# Altium PCB Gateway-Device-v1.0.PcbDoc (part 1 of 4)
Units mil, origin at the board's own origin, x right, y up, seen from the top; angles counter-clockwise.
Board outline 1968.5 x 3149.61 mil, 4 copper layers (Top Layer, Ground, Power, Bottom Layer), stack 61.654 mil thick; 142 components, 90 nets, 467 pads, 780 vias.
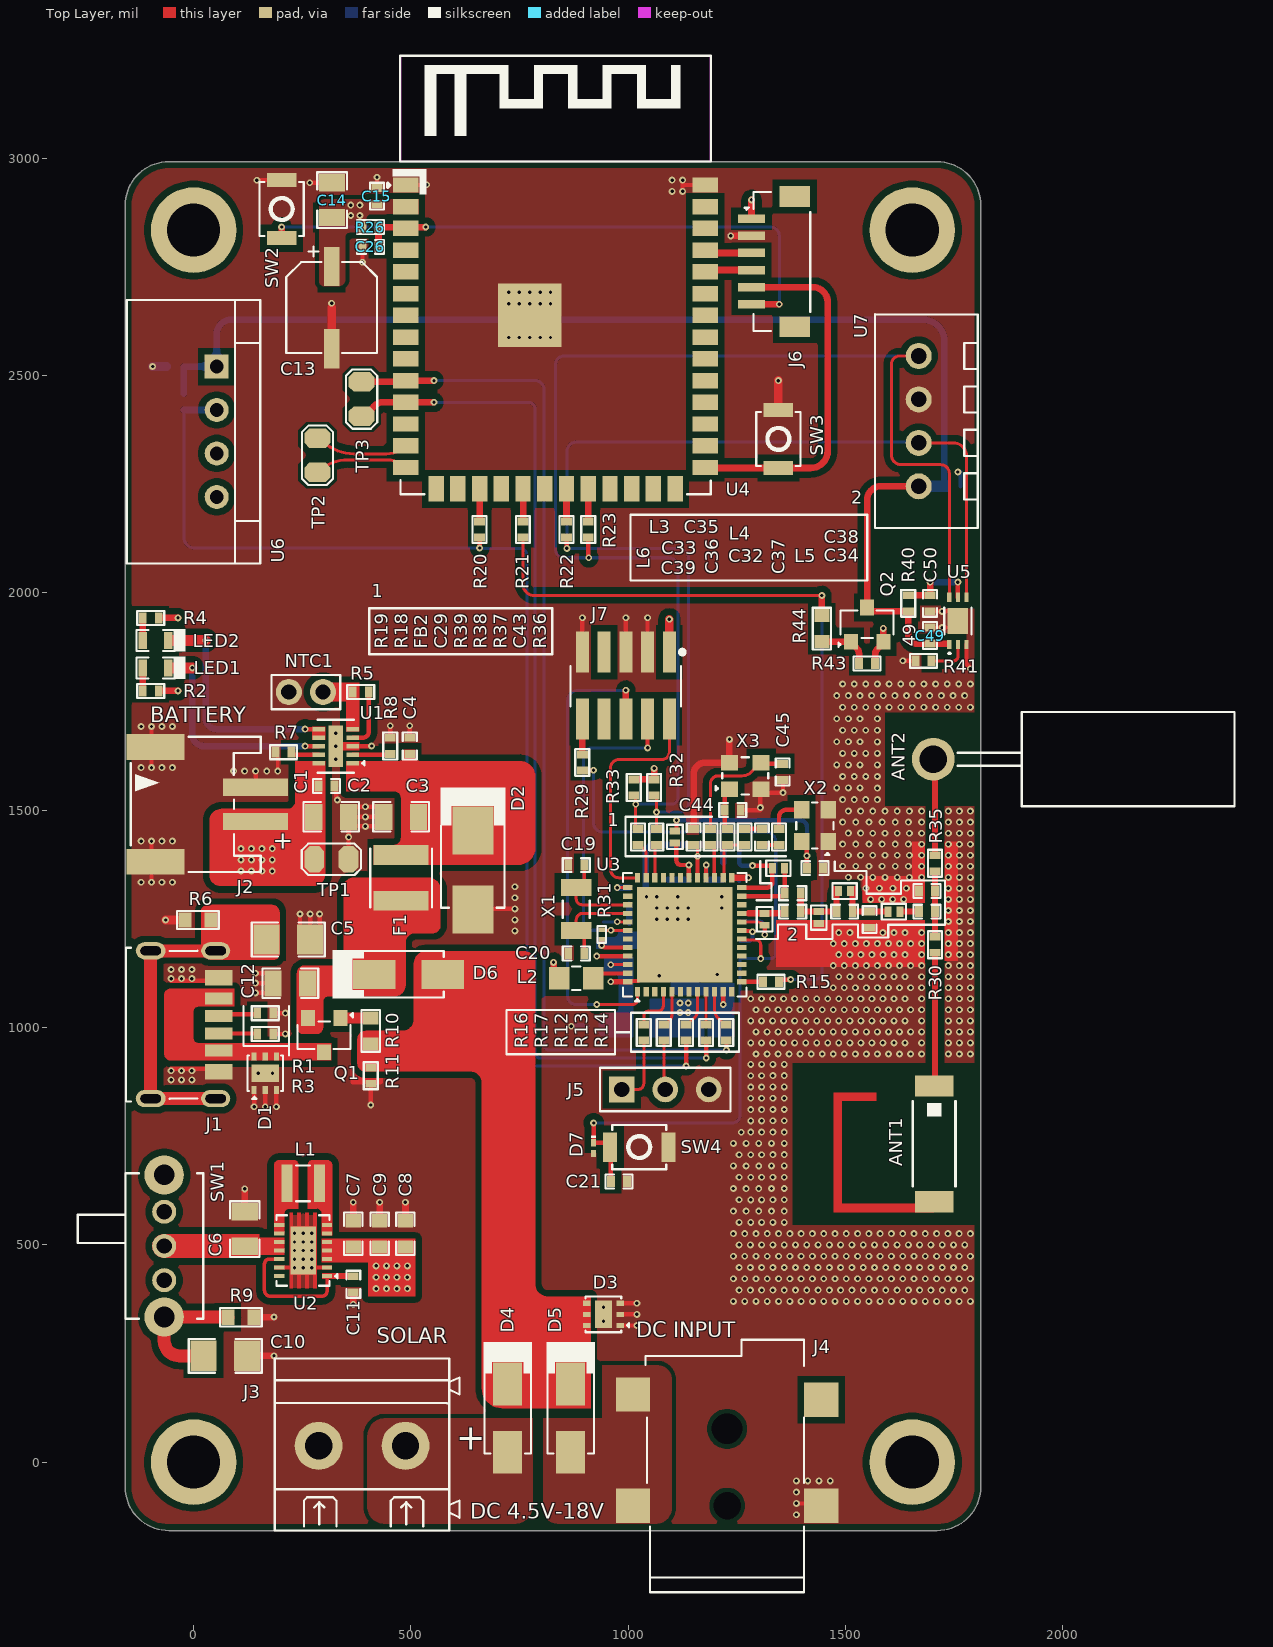
[diagram p0: Top Layer view]
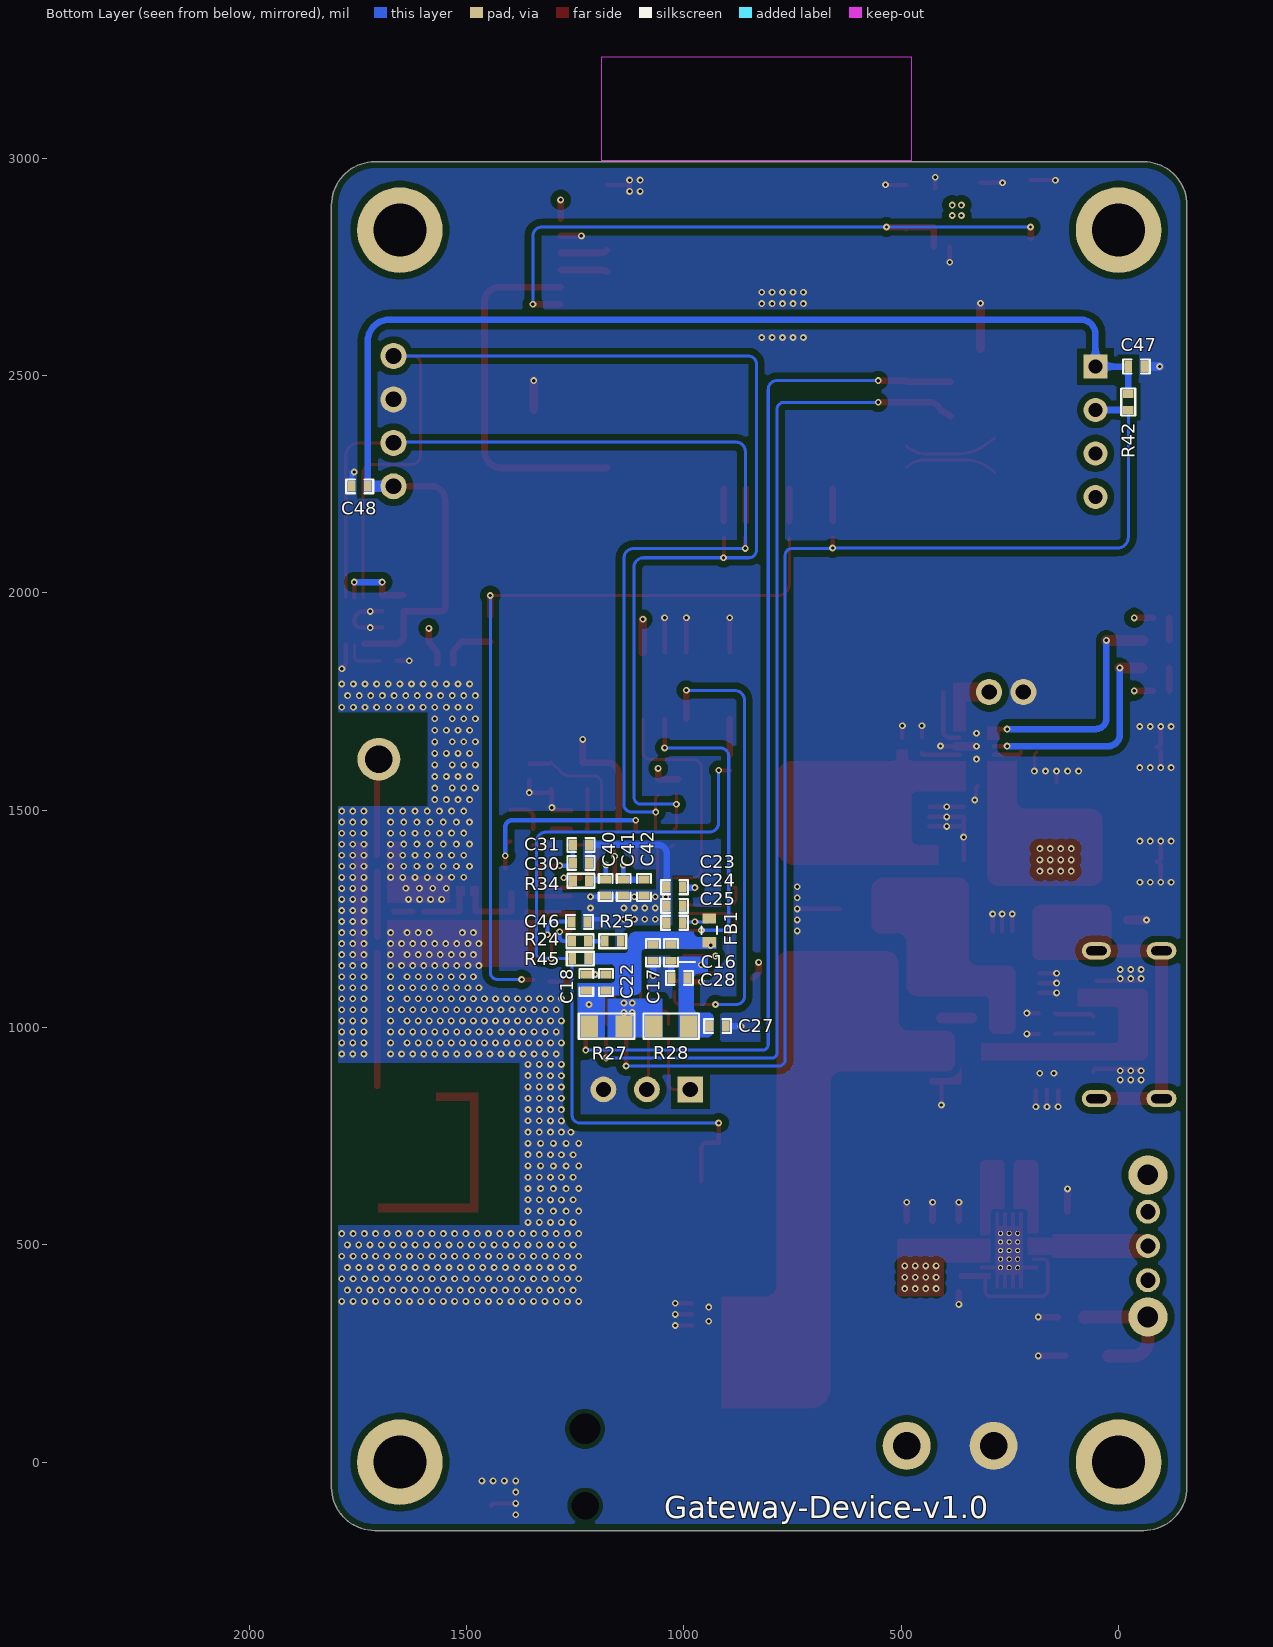
[diagram p1: Bottom Layer view, seen from below]
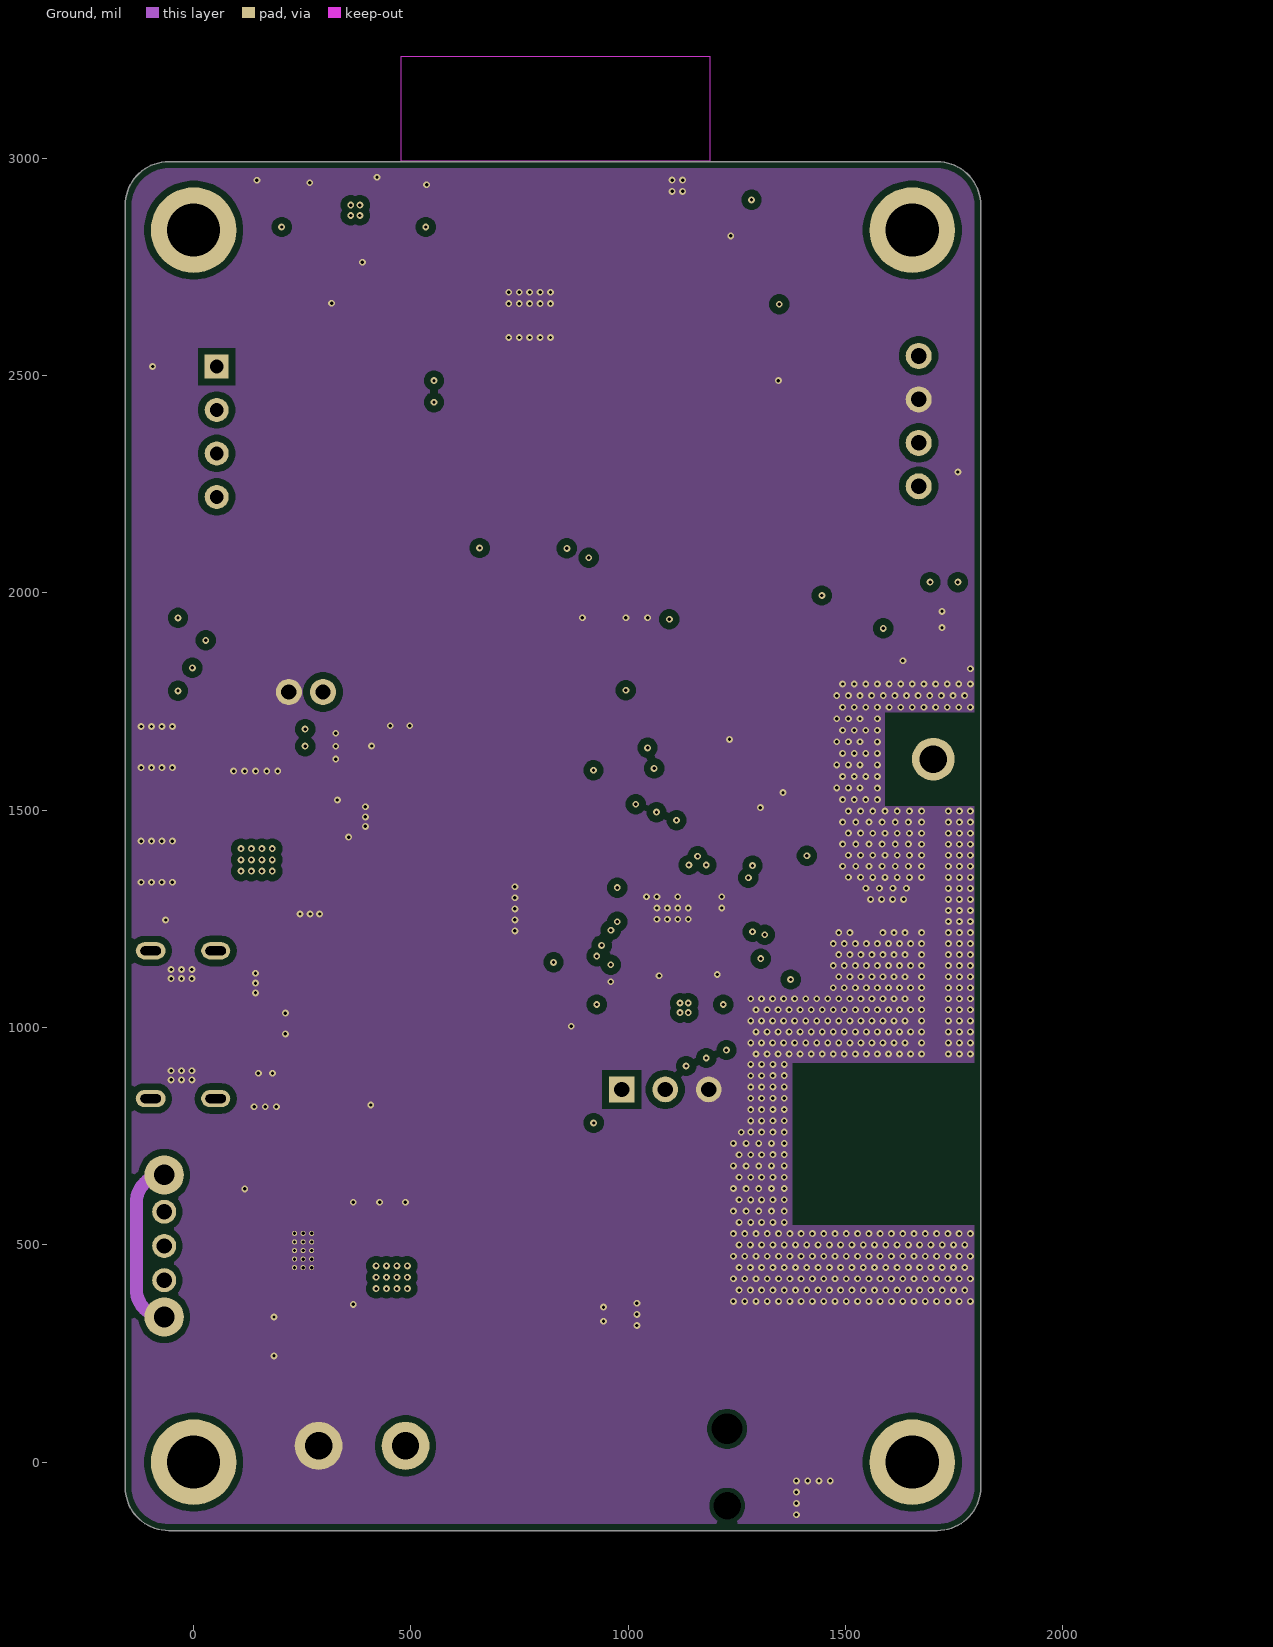
[diagram p2: Ground]
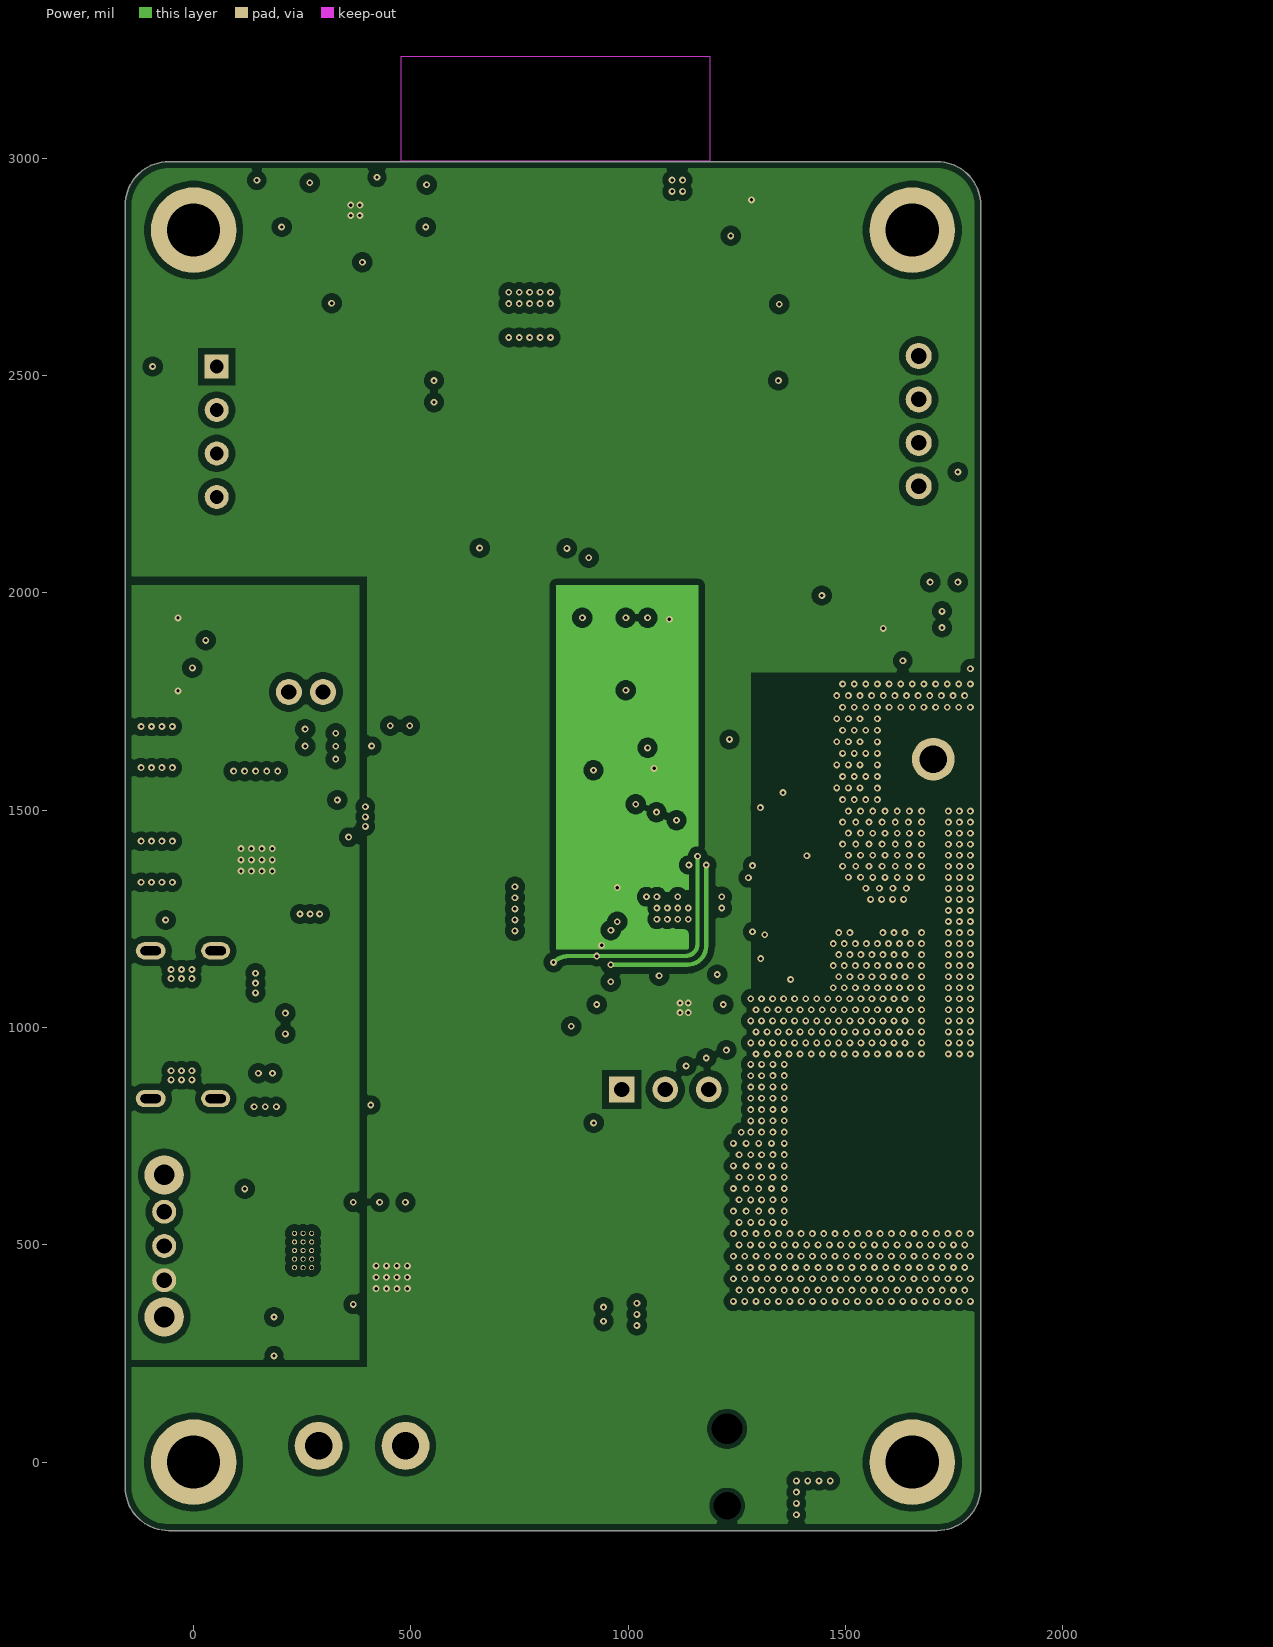
[diagram p3: Power]
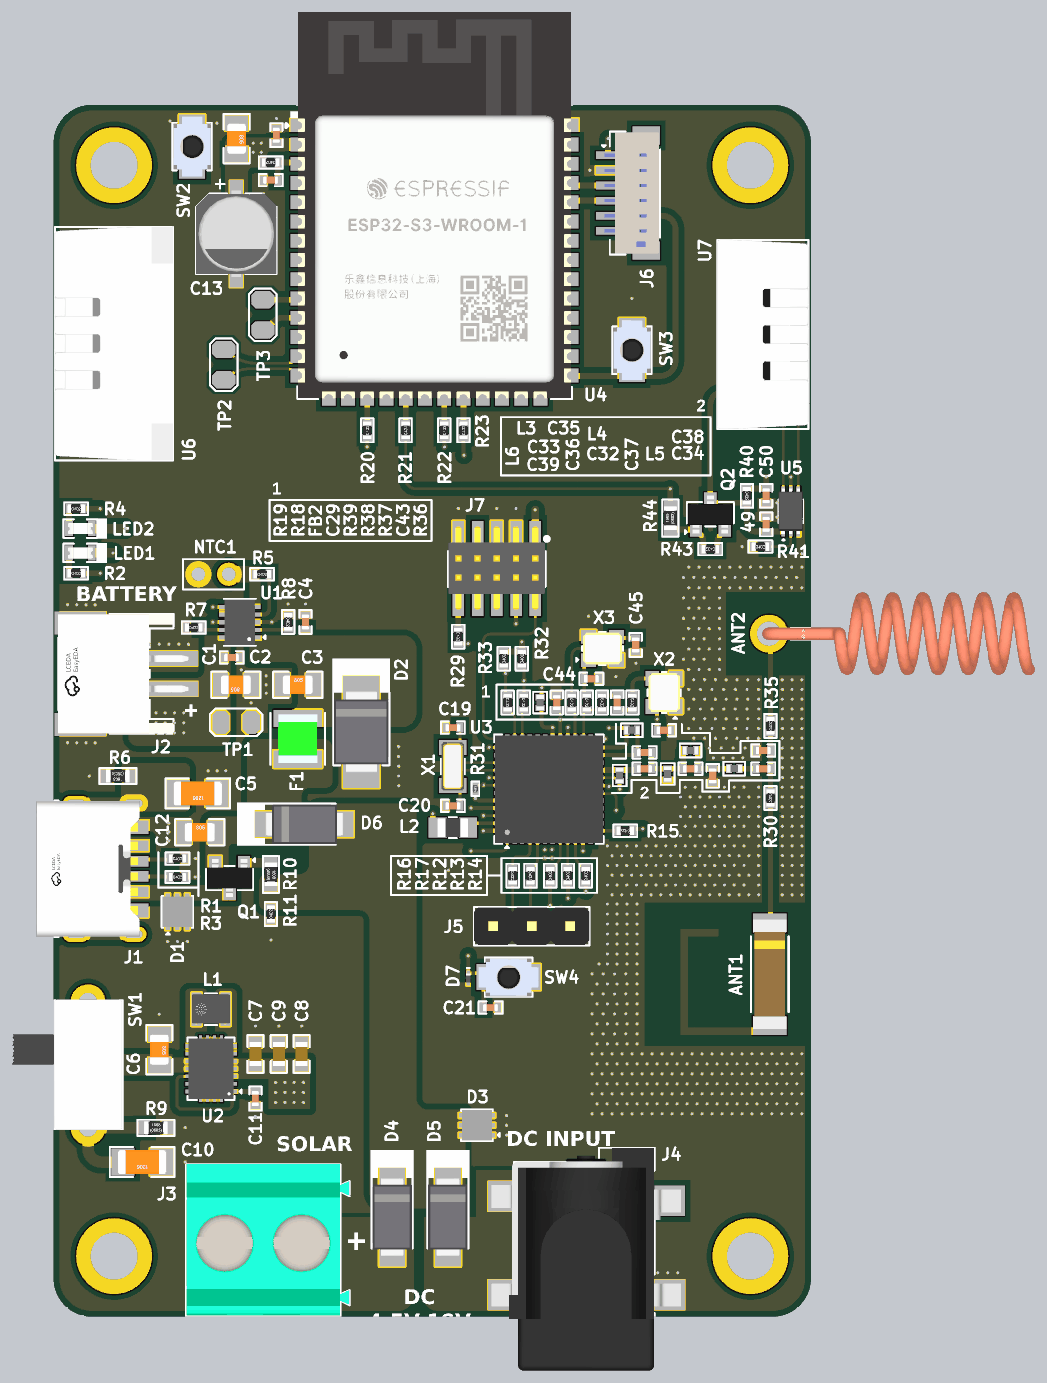
[diagram p5: 3D render of the assembled board from above, using the file's embedded part models]
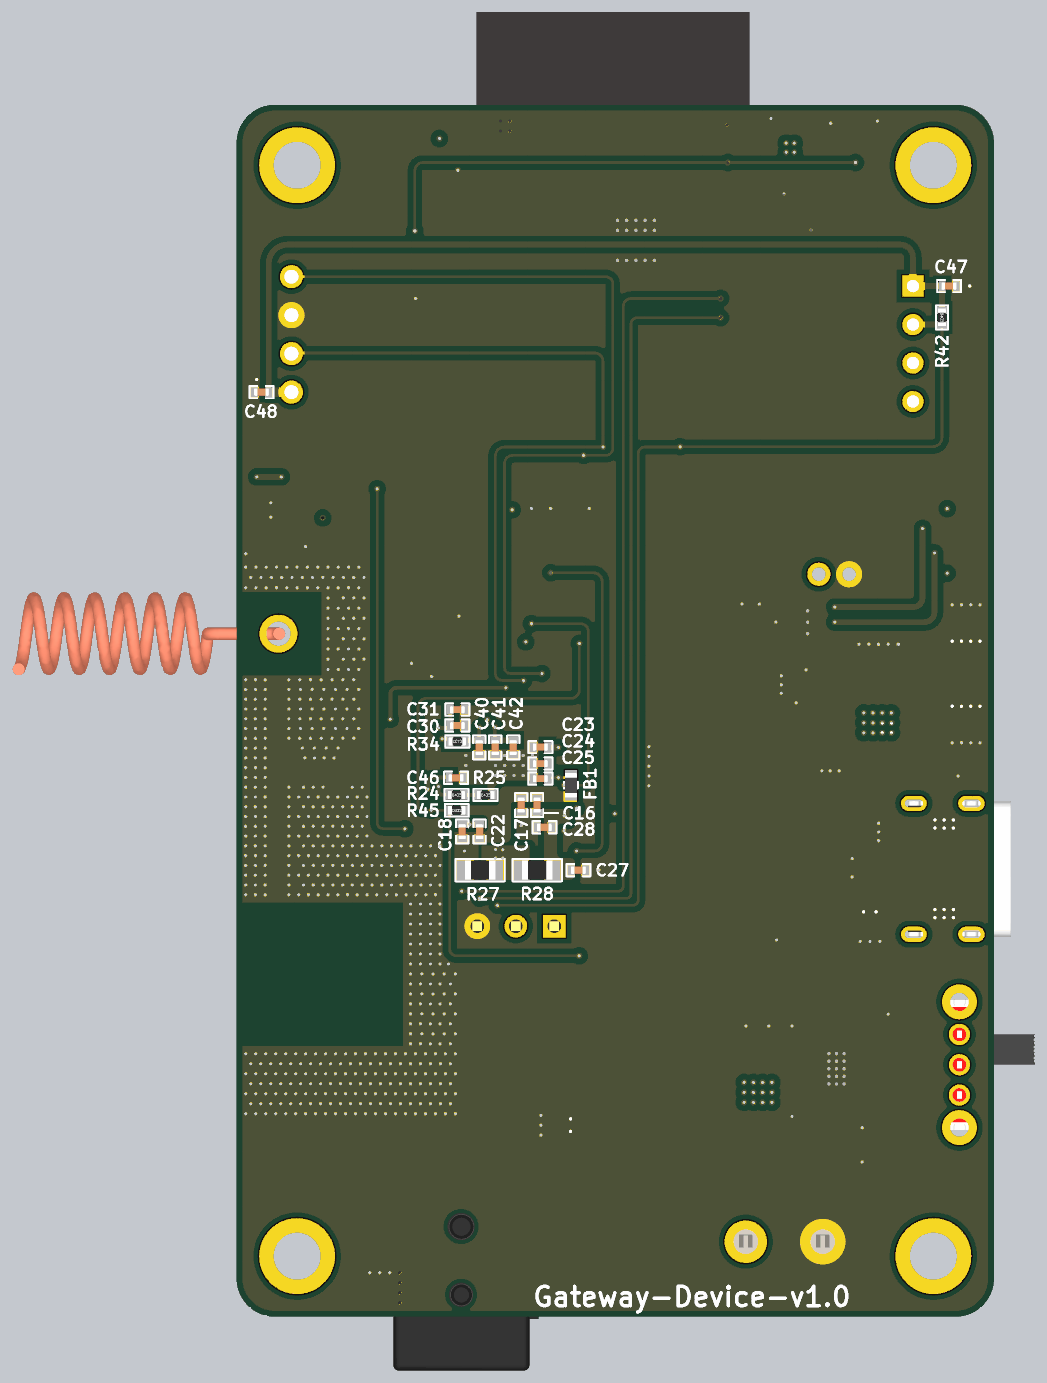
[diagram p6: 3D render of the assembled board from below, using the file's embedded part models]

## Layer stack, top to bottom
Top Solder: solder mask 0.4567, Solder Resist, Dk 3.5
Top Layer: signal copper 1.378
Dielectric 2: prepreg 7.9921, PP-006, Dk 4.4
Ground: signal copper 1.1811
Dielectric 1: core 40.5512, FR-4, Dk 4.6
Power: signal copper 1.1811
Dielectric 3: prepreg 7.9921, PP-006, Dk 4.4
Bottom Layer: signal copper 1.378
Bottom Solder: solder mask 0.4567, Solder Resist, Dk 3.5

## Board outline
-157.48,-57.48 -157.48,2892.13 cw(c-57.48,2892.13) -57.48,2992.13 1711.03,2992.13 cw(c1711.03,2892.13) 1811.03,2892.13 1811.03,-57.48 cw(c1711.03,-57.48) 1711.03,-157.48 -57.48,-157.48 cw(c-57.48,-57.48)

## Design rules (kind name [scope] priority, off if disabled: settings)
BoardOutlineClearance [All] p1: gap=0 ignorepadtopadclearanceinfootprint=FALSE except(15: Poly-OutlineEdge)
Clearance [All] p1: gap=7 ignorepadtopadclearanceinfootprint=TRUE except(5: Arc-Region Track-Region SMDPad-Region; 10: Arc-Text Arc-Hole Track-Text Track-Hole SMDPad-Text SMDPad-Hole THPad-Text THPad-Hole Via-Text Via-Hole Fill-Poly Fill-Text Fill-Hole Poly-Poly Poly-Text Poly-Hole Region-Text Text-Text Text-Hole; 15: Arc-Poly Track-Poly SMDPad-Poly THPad-Poly Via-Poly Poly-Region)
ComponentClearance [All] p1: gap=0 collisioncheckmode=3 verticalgap=0 showdistances=FALSE
DiffPairsRouting [InDifferentialPairClass('USB_LINES')] p1: maxlimit=6.7 minlimit=5 mostfreqgap=6.7 toplayer_mingap=6.7 toplayer_minwidth=11 toplayer_maxwidth=11 toplayer_prefwidth=11 midlayer1_maxgap=5 midlayer1_prefgap=5 midlayer1_minwidth=4.58 midlayer1_maxwidth=4.58 midlayer1_prefwidth=4.58 midlayer2_maxgap=5 midlayer2_prefgap=5 midlayer2_minwidth=4.58 midlayer2_maxwidth=4.58 midlayer2_prefwidth=4.58 bottomlayer_mingap=6.7 bottomlayer_minwidth=11 bottomlayer_maxwidth=11 bottomlayer_prefwidth=11 impedanceprofiledriven=TRUE impedanceprofileid={637A4964-5C93-4761-ADDB-9B271B462112} impedanceprofilevalue=90.000000 maxuncoupledlength=500
Height [All] p1: minheight=0 maxheight=2000 prefheight=500
HoleSize [All] p1: absolutevalues=TRUE maxlimit=1000 minlimit=1 maxpercent=80.000 minpercent=20.000
MatchedLengths "Schematic Matched Net Lengths" [InNetClass('USB_PROGRAM')] p1: tolerance=50 checknetsindiffpair=TRUE checkdiffpairvsdiffpair=FALSE checkxsignals=FALSE checkothers=FALSE
MaxMinImpedance "Schematic Impedance Constraint" [InNetClass('USB_PROGRAM')] p1: minimum=85.00 maximum=90.00
MinimumSolderMaskSliver [All] p1: minsoldermaskwidth=0
PolygonConnect [All] p1: connectstyle=Direct reliefconductorwidth=10 reliefentries=4 polygonreliefangle="90 Angle" airgapwidth=10
RoutingVias [All] p1: holewidth=7.87 width=15.75 viastyle="Through Hole" minholewidth=7.87 minwidth=15.75 maxholewidth=7.87 maxwidth=15.75
SilkToSilkClearance [All] p1: silktosilkclearance=0
SilkToSolderMaskClearance [IsPad] p1: minsilkscreentomaskgap=0 clearancetoexposedcopper=TRUE
SolderMaskExpansion [All] p1: expansion=4 istentingtop=FALSE
SupplyNets "Schematic Supply Nets_18" [InNet('3V3-SW')] p1: voltage=0.000
SupplyNets "Schematic Supply Nets_17" [InNet('VIN')] p2: voltage=0.000
SupplyNets "Schematic Supply Nets_16" [InNet('VDD')] p3: voltage=0.000
SupplyNets "Schematic Supply Nets_15" [InNet('VDDPA')] p4: voltage=0.000
SupplyNets "Schematic Supply Nets_14" [InNet('VUSB')] p5: voltage=0.000
SupplyNets "Schematic Supply Nets_13" [InNet('VDDRF1V55')] p6: voltage=0.000
SupplyNets "Schematic Supply Nets_12" [InNet('DC-IN')] p7: voltage=0.000
SupplyNets "Schematic Supply Nets_11" [InNet('PB0-VDD_TCXO')] p8: voltage=0.000
SupplyNets "Schematic Supply Nets_10" [InNet('VBUS')] p9: voltage=0.000
SupplyNets "Schematic Supply Nets_9" [InNet('VDDRF')] p10: voltage=0.000
SupplyNets "Schematic Supply Nets_2" [InNet('VBAT')] p11: voltage=0.000
SupplyNets "Schematic Supply Nets_3" [InNet('3V3')] p12: voltage=0.000
SupplyNets "Schematic Supply Nets" [InNet('GND')] p13: voltage=0.000
UnRoutedNet [All] p1: checkbadconnections=TRUE
Width Width_RF [InNetClass('RF_LINES')] p1: maxlimit=13.98 minlimit=9.58 preferedwidth=13.98 toplayer_minwidth=13.98 midlayer1_maxwidth=9.58 midlayer1_prefwidth=9.58 midlayer2_maxwidth=9.58 midlayer2_prefwidth=9.58 bottomlayer_minwidth=13.98 impedanceprofiledriven=TRUE impedanceprofileid={EFC23597-3C74-436F-8216-7E33C33C23CB} impedanceprofilevalue=50.000000 minimp=50.000000 maximp=50.000000 favimp=50.000000
Width [All] p2: maxlimit=50 minlimit=7 preferedwidth=10 minimp=50.000000 maximp=50.000000 favimp=50.000000
22 further rules are at their usual default settings.

## Classes and differential pairs
net class RF_LINES: NetANT1_1 NetANT2_1 NetC32_1 NetC32_2 NetC34_1 NetC34_2
differential pair class USB_PROGRAM_LINES: TYPEC
net class USB_PROGRAM: TYPEC_N TYPEC_P
component class Sensor-Sheet: C47 C48 C49 C50 Q2 R40 R41 R42 R43 R44 U5 U6 U7
component class Power-Sheet: C1 C2 C3 C4 C5 C6 C7 C8 C9 C10 C11 C12 D1 D2 D3 D4 D5 D6 F1 J1 J2 J3 J4 L1 LED1 LED2 NTC1 Q1 R1 R2 R3 R4 R5 R6 R7 R8 R9 R10 R11 SW1 TP1 U1 U2
component class MCU-Sheet: ANT1 ANT2 C13 C14 C15 C16 C17 C18 C19 C20 C21 C22 C23 C24 C25 C26 C27 C28 C29 C30 C31 C32 C33 C34 C35 C36 C37 C38 C39 C40 C41 C42 C43 C44 C45 C46 D7 FB1 FB2 J5 J6 J7 l L2 L3 L4 L5 L6 R12 R13 R14 R15 R16 R17 R18 R19 R20 R21 R22 R23 R24 R25 R26 R27 R28 R29 R30 R31 R32 R33 R34 R35 R36 R37 R38 R39 R45 SW2 SW3 SW4 TP2 TP3 U3 U4 X1 X2 X3
differential pair TYPEC: +TYPEC_P -TYPEC_N

## Components (designator, comment, footprint, x,y, rotation, side; value= is the part's Value field where it differs from the comment)
ANT1 "0915AT43A0026001E" 0915AT43A0026001E 1703.92,732.54 r270 top
ANT2 "VG915SNX17-5W2" VG915SNX17-5W2 1701.96,1617.52 r90 top
C1 "10uF" Cap-0805 316.52,1484.84 r180 top
C2 "0.1uF" Cap-0402 305.52,1555.99 r180 top
C3 "10uF" Cap-0805 477.32,1484.84 r0 top
C4 "0.1uF" Cap-0402 497.32,1648.15 r270 top
C5 "4.7nF" Cap-1206 217.68,1202.6 r180 top
C6 "22uF" Cap-0805 117.52,536.4 r270 top
C7 "10uF" Cap-0603 367.34,525.45 r270 top
C8 "10uF" Cap-0603 487.35,525.45 r270 top
C9 "10uF" Cap-0603 427.97,525.45 r270 top
C10 "4.7nF" Cap-1206 72.76,244.52 r180 top
C11 "0.1uF" Cap-0402 367.35,409.39 r90 top
C12 "10uF" Cap-0805 222.68,1101.65 r0 top
C13 "47uF" RVT1E470M0505 317.58,2656.54 r270 top
C14 "22uF" Cap-0805 318.58,2904.02 r270 top
C15 "0.1uF" Cap-0402 421.88,2913.02 r270 top
C16 "4.7uF" Cap-0402 1029.96,1172.11 r90 bottom
C17 "0.1uF" Cap-0402 1071.03,1172.11 r90 bottom
C18 "33pF" Cap-0402 1224.54,1103.46 r270 bottom
C19 "6.8pF" Cap-0402 880.3,1373.62 r0 top
C20 "6.8pF" Cap-0402 880.3,1170.31 r0 top
C21 "0.1uF" Cap-0402 978.5,646 r180 top
C22 "0.1uF" Cap-0402 1179.26,1103.46 r270 bottom
C23 "33pF" Cap-0402 1021.37,1322.89 r180 bottom
C24 "4.7uF" Cap-0402 1021.37,1280.16 r180 bottom
C25 "0.1uF" Cap-0402 1021.37,1241.15 r180 bottom
C26 "1uF" Cap-0402 406.86,2796.45 r0 top
C27 "4.7uF" Cap-0402 922.41,1003.1 r0 bottom
C28 "0.1uF" Cap-0402 1010.5,1114.46 r180 bottom
C29 "470nF" Cap-0402 1150.48,1438.62 r270 top
C30 "47nF" Cap-0402 1237.04,1379.07 r0 bottom
C31 "68pF" Cap-0402 1237.04,1420.29 r0 bottom
C32 "2.2pF" Cap-0402 1497.97,1266.77 r0 top
C33 "33pF" Cap-0402 1378.5,1309.11 r0 top
C34 "33pF" Cap-0402 1687.21,1266.77 r0 top
C35 "10nF" Cap-0402 1429.47,1366.7 r180 top
C36 "0.7pF" IND-0402 1438.55,1252.99 r90 top
C37 "7.5pF" Cap-0402 1555.52,1248.27 r90 top
C38 "2.2pF" Cap-0402 1687.21,1314.11 r0 top
C39 "4pF" Cap-0402 1378.5,1266.77 r0 top
C40 "0.1uF" Cap-0402 1180.17,1322.03 r90 bottom
C41 "0.1uF" Cap-0402 1138.8,1322.03 r90 bottom
C42 "47pF" Cap-0402 1091.8,1322.03 r90 bottom
C43 "10pF" Cap-0402 1307.45,1438.62 r90 top
C44 "9pF" Cap-0402 1240.36,1500.38 r180 top
C45 "9pF" Cap-0402 1355.36,1588.12 r90 top
C46 "4.3pF" Cap-0402 1240.36,1243.15 r0 bottom
C47 "0.1uF" Cap-0402 -40.98,2521 r0 bottom
C48 "0.1uF" Cap-0402 1746.02,2245.38 r180 bottom
C49 "0.1uF" Cap-0402 1694.52,1901.89 r270 top
C50 "0.1uF" Cap-0402 1694.52,1976.16 r90 top
D1 "TVS0500DRVR" WSON-6(2x2) 164.68,894.79 r90 top
D2 "SMBJ5355B-MS" SMB_ 642.52,1362.52 r90 top
D3 "TVS1800DRVR" WSON-6(2x2) 943,340 r180 top
D4 "SS24A" SMA 722.52,101.26 r270 top
D5 "SS24A" SMA 867.52,101.26 r270 top
D6 "SS24A" SMA 494.54,1122.52 r0 top
D7 "ESDALC6V1-1U2" Diode-0201 920.28,722.67 r270 top value=12pF
F1 "1210L075/24PR" FUSE-1210 477.32,1344.46 r90 top
FB1 "FCM1608KF-601T03" "IND-0603 (1608 Metric)" 941.95,1223.62 r90 bottom
FB2 "BLM15HG102SN1D" IND-0402 1107.3,1438.61 r270 top
J1 "TYPE-C-31-M-17" TYPE-C-31-M-17_ -20.48,1006.52 r270 top
J2 "S2B-PH-SM4-TB(LF)(SN)" S2B-PH-SM4-TB(LF)(SN) 27.52,1513.52 r270 top
J3 "DB128L-5.08-2P-GN-S" DB128L-5.08-2P-GN-S 387.52,37.52 r180 top
J4 "DC-050-B200" DC-050-B200 1227.52,27.52 r90 top
J5 "X6511WV-03H-C60D30" HDR1X3_ 985.2,857.52 r0 top
J6 "Voltlink Target" "Voltlink Target" 1333.34,2762.67 r270 top
J7 "X1321WVS-2x05J-C40D53" X1321WVS-2x05J-C40D53 994.45,1786.95 r180 top
L1 "1uH" "IND-1008 (2520 Metric)" 251.84,641.43 r0 top
L2 "15uH" IND-0805 880.3,1113.41 r0 top
L3 "47nH" IND-0402 1345.52,1366.7 r180 top
L4 "3.3nH" IND-0402 1497.97,1314.11 r0 top
L5 "8.2nH" IND-0402 1611.45,1266.77 r0 top
L6 "9.1nH" IND-0402 1313.79,1249.05 r90 top
LED1 "RED" LED-0603 -87.63,1827.52 r0 top
LED2 "Emerald" LED-0603 -87.63,1890.76 r0 top
NTC1 "10K" "MF51B 103F3435" 258.39,1772.02 r0 top
Q1 "AOSS21311C" SOT-23 300.08,982.83 r180 top
Q2 "AO3401" SOT-23 1549.52,1927.38 r0 top
R1 "5.1K" Res-0402 164.68,1033.21 r0 top
R2 "220R" Res-0402 -98.66,1774.63 r0 top
R3 "5.1K" Res-0402 164.68,985.29 r0 top
R4 "220R" Res-0402 -98.66,1942.52 r0 top
R5 "21.5K" Res-0402 384.57,1772.02 r0 top value=21.5kR
R6 "1M" Res-0603 9.78,1247.52 r0 top
R7 "6.98K" Res-0402 206.87,1633.65 r0 top value=6.98kR
R8 "536R" Res-0402 452.41,1648.15 r270 top
R9 "1M" Res-0603 108.76,333.41 r180 top
R10 "10R" Res-0603 407.52,992.2 r90 top
R11 "47K" Res-0402 407.52,889.02 r90 top
R12 "0R" Res-0402 1133.15,988.62 r90 top
R13 "0R" Res-0402 1179.35,988.62 r90 top
R14 "0R" Res-0402 1225.55,988.62 r90 top
R15 "0R" Res-0402 1328.52,1105.35 r180 top
R16 "0R" Res-0402 1035.74,988.62 r270 top
R17 "0R" Res-0402 1081.94,988.62 r270 top
R18 "0R" Res-0402 1064.67,1438.62 r270 top
R19 "0R" Res-0402 1022.69,1438.62 r270 top
R20 "0R" Res-0402 657.93,2146.02 r90 top
R21 "0R" Res-0402 757.52,2146.02 r90 top
R22 "0R" Res-0402 857.93,2146.02 r90 top
R23 "0R" Res-0402 907.93,2146.02 r90 top
R24 "0R" Res-0402 1239.36,1198.57 r180 bottom
R25 "10K" Res-0402 1163.86,1198.57 r180 bottom
R26 "10K" Res-0402 406.87,2842.02 r180 top
R27 "0R" Res-0805 1177.95,1003.1 r0 bottom
R28 "0R" Res-0805 1029.37,1003.1 r180 bottom
R29 "0R" Res-0402 894.45,1609.9 r270 top
R30 "0R" Res-0402 1705.71,1190.52 r270 top
R31 "1K" Res-0201 939,1214.32 r270 top
R32 "4.7K" Res-0402 1059.67,1552.62 r90 top
R33 "4.7K" Res-0402 1012.69,1552.62 r90 top
R34 "0R" Res-0402 1237.04,1337.53 r0 bottom
R35 "0R" Res-0402 1705.71,1378.02 r90 top
R36 "220R" Res-0402 1346.91,1438.62 r270 top
R37 "0R" Res-0402 1267.86,1438.62 r270 top
R38 "0R" Res-0402 1228.54,1438.62 r270 top
R39 "0R" Res-0402 1189.59,1438.61 r270 top
R40 "1K" Res-0402 1644.52,1976.16 r270 top
R41 "4.7K" Res-0402 1679.52,1843.89 r0 top
R42 "4.7K" Res-0402 -22.48,2439.5 r270 bottom
R43 "1K" Res-0402 1549.52,1837.42 r180 top
R44 "10R" Res-0603 1445.52,1918.01 r270 top
R45 "10K" Res-0402 1238.69,1158.5 r180 bottom
SW1 "SK-12D29-G060" SK-12D29-G060 -67.69,497.4 r270 top
SW2 "B3U-1000P" B3U-1000P 202.52,2883.45 r90 top
SW3 "B3U-1000P" B3U-1000P 1345.52,2354.45 r90 top
SW4 "B3U-1000P" B3U-1000P 1025.28,724.98 r0 top
TP1 "2 Test Pad" "2 Test Pad" 277.58,1387.21 r0 top
TP2 "2 Test Pad" "2 Test Pad" 285,2277.37 r90 top
TP3 "2 Test Pad" "2 Test Pad" 386.52,2485.52 r270 top
U1 "BQ24210DQCR" "10-WSON (3x2)" 326.89,1647.34 r180 top
U2 "TPS63021DSJR" "14-VSON (4x3)" 251.84,486.94 r180 top
U3 "STM32WLE5CBU6" 48-UFQFPN(7x7) 1129.95,1213.62 r90 top
U4 "ESP32-S3-WROOM-1-N8R2" "41-SMD Module" 832.74,2589.13 r0 top locked
U5 "BH1750FVI-TR" 6-WSOF 1758.52,1935.52 r90 top
U6 "AM2302" AM2302 53.08,2371 r270 top
U7 "AGS02MA" AGS02MA 1668.32,2395.38 r90 top
X1 "32.7680KHZ" NX3215SA-32.768K-STD-MUA-8_ 880.3,1272.68 r90 top
X2 "32MHz" SMD2520-4P 1429.47,1464.7 r90 top
X3 "32MHz" SMD2520-4P 1269.36,1579.12 r0 top

## Footprints (in the part's own frame and the unit in brackets; to place one, negate y for a bottom-side part, rotate by r counter-clockwise, add the part's x,y. Pads: shape width x height; smd on the part's side, far side on the other; paste and mask are expansions set on the pad)
"2 Test Pad" [mil]
  oct 45x60 smd: 1(0,0) 2(78.74,0)
  silkscreen extent -29,-36 108,36
6-WSOF [mm]
  rect 0.55x0.25 smd: 1(-1.375,0.5) 2(-1.375,0) 3(-1.375,-0.5) 4(1.375,-0.5) 5(1.375,0) 6(1.375,0.5)
  rect 1.5x1.2 smd: 7(0,0)
  silkscreen extent -1.91,-0.8 0.78,0.8, body extent -1.5,-0.8 1.5,0.8, height 0.75
"10-WSON (3x2)" [mm]
  rect 0.74x0.27 smd: 1(-0.995,1) 2(-0.995,0.5) 3(-0.995,0) 4(-0.995,-0.5) 5(-0.995,-1) 6(0.995,-1) 7(0.995,-0.5) 8(0.995,0) 9(0.995,0.5) 10(0.995,1)
  rect 0.84x2.4 smd: 11(0,0)
  silkscreen extent -1.68,-1.55 1.05,1.55, body extent -1,-1.5 1,1.5, height 0.8
"14-VSON (4x3)" [mm]
  rect 0.6x0.24 smd: 1(-1.4,1.5) 2(-1.4,1) 3(-1.4,0.5) 4(-1.4,0) 5(-1.4,-0.5) 6(-1.4,-1) 7(-1.4,-1.5) 8(1.4,-1.5) 9(1.4,-1) 10(1.4,-0.5) 11(1.4,0) 12(1.4,0.5) 13(1.4,1) 14(1.4,1.5)
  round 0.3 hole 0.2 mask+0.102: 15(-0.5,0.5) 15(-0.5,1) 15(-0.5,0) 15(-0.5,-1) 15(-0.5,-0.5) 15(0,1) 15(0,0.5) 15(0,0) 15(0,-0.5) 15(0,-1) 15(0.5,0.5) 15(0.5,1) 15(0.5,0) 15(0.5,-1) 15(0.5,-0.5)
  rect 1.5x2.8 smd: 15(0,0)
  Top Layer region: 0.79,-2.2 0.59,-2.2 0.59,-1.425 0.33,-1.425 0.33,-2.2 0.13,-2.2 0.13,-1.425 -0.13,-1.425 -0.13,-2.2 -0.33,-2.2 -0.33,-1.425 -0.59,-1.425 -0.59,-2.2 -0.79,-2.2 -0.79,2.2 -0.59,2.2 -0.59,1.425 -0.33,1.425 -0.33,2.2 -0.13,2.2 -0.13,1.425 0.13,1.425 0.13,2.2 0.33,2.2 0.33,1.425 0.59,1.425 0.59,2.2 0.79,2.2
  silkscreen extent -2.01,-2.06 1.55,2.06, body extent -1.5,-2 1.5,2, height 1
"41-SMD Module" [mm]
  rect 1.5x0.9 smd: 1(-8.75,8.88) 2(-8.75,7.61) 3(-8.75,6.34) 4(-8.75,5.07) 5(-8.75,3.8) 6(-8.75,2.53) 7(-8.75,1.26) 8(-8.75,-0.01) 9(-8.75,-1.28) 10(-8.75,-2.55) 11(-8.75,-3.82) 12(-8.75,-5.09) 13(-8.75,-6.36) 14(-8.75,-7.63) 27(8.75,-7.63) 28(8.75,-6.36) 29(8.75,-5.09) 30(8.75,-3.82) 31(8.75,-2.55) 32(8.75,-1.28) 33(8.75,-0.01) 34(8.75,1.26) 35(8.75,2.53) 36(8.75,3.8) 37(8.75,5.07) 38(8.75,6.34) 39(8.75,7.61) 40(8.75,8.88)
  rect 0.9x1.5 smd: 15(-6.98,-8.88) 16(-5.71,-8.88) 17(-4.44,-8.88) 18(-3.17,-8.88) 19(-1.9,-8.88) 20(-0.63,-8.88) 21(0.64,-8.88) 22(1.91,-8.88) 23(3.18,-8.88) 24(4.45,-8.88) 25(5.72,-8.88) 26(6.99,-8.88)
  rect 3.7x3.7 smd: 41(-1.5,1.26)
  Keep-Out Layer region: -9.042,10.287 9.042,10.287 9.042,16.383 -9.042,16.383
  silkscreen extent -9.8,-9.2 9.09,16.43, body extent -9.01,-9.14 9.01,16.37, height 3.16
48-UFQFPN(7x7) [mm]
  rect 0.55x0.3 smd: 1(-3.325,2.75) 2(-3.325,2.25) 3(-3.325,1.75) 4(-3.325,1.25) 5(-3.325,0.75) 6(-3.325,0.25) 7(-3.325,-0.25) 8(-3.325,-0.75) 9(-3.325,-1.25) 10(-3.325,-1.75) 11(-3.325,-2.25) 12(-3.325,-2.75) 25(3.325,-2.75) 26(3.325,-2.25) 27(3.325,-1.75) 28(3.325,-1.25) 29(3.325,-0.75) 30(3.325,-0.25) 31(3.325,0.25) 32(3.325,0.75) 33(3.325,1.25) 34(3.325,1.75) 35(3.325,2.25) 36(3.325,2.75)
  rect 0.3x0.55 smd: 13(-2.75,-3.325) 14(-2.25,-3.325) 15(-1.75,-3.325) 16(-1.25,-3.325) 17(-0.75,-3.325) 18(-0.25,-3.325) 19(0.25,-3.325) 20(0.75,-3.325) 21(1.25,-3.325) 22(1.75,-3.325) 23(2.25,-3.325) 24(2.75,-3.325) 37(2.75,3.325) 38(2.25,3.325) 39(1.75,3.325) 40(1.25,3.325) 41(0.75,3.325) 42(0.25,3.325) 43(-0.25,3.325) 44(-0.75,3.325) 45(-1.25,3.325) 46(-1.75,3.325) 47(-2.25,3.325) 48(-2.75,3.325)
  rect 5.6x5.6 smd: 49(0,0)
  silkscreen extent -3.89,-3.61 3.61,3.61, body extent -3.56,-3.56 3.56,3.56, height 0.61
0915AT43A0026001E [mil]
  rect 49.21x88 smd: 1(-133,0) 2(133,0)
  Top Layer region: -117.98,-231.59 -98.3,-231.59 -98.3,-133.16 -117.98,-133.16
  Top Layer region: -117.98,-231.6 157.61,-231.6 157.61,-211.91 -117.98,-211.91
  Top Layer region: 137.92,-231.59 157.61,-231.59 157.61,0 137.92,0
  silkscreen extent -98,-49 98,49, body extent -142,-44 142,44, height 35
AGS02MA [mil]
  round 60 hole 36: 1(-150,0) 2(-50,0) 3(50,0) 4(150,0)
  silkscreen extent -246,-136 246,100, body extent -246,-136 246,101, height 630
AM2302 [mm]
  rect 1.4x1.4 hole 0.8: 1(-3.81,0)
  round 1.4 hole 0.8: 2(-1.27,0) 3(1.27,0) 4(3.81,0)
  silkscreen extent -7.71,-5.26 7.7,2.54, body extent -7.72,-5.27 7.68,2.53, height 25.24
B3U-1000P [mm] "SWITCH TACTILE SPST-NO 0.05A 12V"
  rect 0.82x1.72 smd: 1(-1.7,0) 2(1.7,0)
  silkscreen extent -1.57,-1.3 1.57,1.3, body extent -2,-1.26 2,1.24, height 1.6
Cap-0402 [mil]
  rect 18x25 smd mask+2.36: 1(-18.5,0) 2(18.5,0)
  silkscreen extent -31,-16 31,16, body extent -20,-10 20,10, height 19
Cap-0603 [mil]
  rect 30x35 smd mask+2.36: 1(-30,0) 2(30,0)
  silkscreen extent -49,-21 49,21, body extent -32,-16 31,16, height 34
Cap-0805 [mil] "SMD 0805"
  rect 40x60 smd mask+2.76: 1(-40,0) 2(40,0)
  silkscreen extent -64,-34 64,34, body extent -39,-25 39,25, height 30
Cap-1206 [mil] "SMD 1206"
  rect 60x70 smd: 1(-50,0) 2(50,0)
  silkscreen extent -84,-39 84,39, body extent -63,-31 63,32, height 39
DB128L-5.08-2P-GN-S [mm]
  round 2.8 hole 1.6: 1(-2.54,0) 2(2.54,0)
  silkscreen extent -5.7,-5.1 5.1,4.95, body extent -5.68,-5.12 5.08,4.88, height 14
DC-050-B200 [mm]
  rect 2x2 smd mask+0.05: 1(-3.25,5.5) 1(3.25,5.5) 2(-3.25,-5.5) 3(2.95,-5.5)
  round 0 hole 1.6 unplated mask+0.05: 2(-3.25,0)
  round 0 hole 1.8 unplated mask+0.05: 3(1.25,0)
  silkscreen extent -8.3,-4.5 6.45,4.78, body extent -8.26,-6.22 6.44,6.28, height 11
Diode-0201 [mm]
  rect 0.425x0.3 smd paste-1 mask+0.05: 1(-0.312,0) 2(0.313,0)
  silkscreen extent -0.74,-0.15 -0.58,0.15, body extent -0.3,-0.15 0.3,0.15, height 0.33
FUSE-1210 [mm]
  rect 1.15x3.2 smd: 1(-1.34,0) 2(1.34,0)
  silkscreen extent -1.71,-1.8 1.72,1.8, body extent -1.61,-1.29 1.61,1.29, height 1.8
HDR1X3_ [mm] "Connector; Header; 3 Position"
  rect 1.5x1.5 hole 0.9: 1(0,0)
  round 1.5 hole 0.9: 2(2.54,0) 3(5.08,0)
  silkscreen extent -1.27,-1.27 6.35,1.27, body extent -1.27,-1.24 6.35,1.25, height 8.54
IND-0402 [mm]
  rect 0.4x0.6 smd: 1(-0.35,0) 2(0.35,0)
  silkscreen extent -0.71,-0.46 0.71,0.46, body extent -0.5,-0.25 0.5,0.25, height 0.25
"IND-0603 (1608 Metric)" [mm] "0.063\" L x 0.032\" W (1.60mm x 0.80mm)"
  rect 0.6x0.8 smd: 1(-0.7,0) 2(0.7,0)
  silkscreen extent -0.2,-0.46 0.23,0.46, body extent -0.8,-0.4 0.8,0.4, height 0.78
IND-0805 [mm] "Inductor 0805"
  rect 1.2x1.32 smd: 1(-1,0) 2(1,0)
  silkscreen extent -0.25,-0.69 0.25,0.69, body extent -1,-0.62 1,0.63, height 0.47
"IND-1008 (2520 Metric)" [mm]
  rect 0.65x2.2 smd: 1(-0.95,0) 2(0.95,0)
  silkscreen extent -0.41,-1.04 0.41,1.04, body extent -1.25,-1 1.25,1, height 1.2
LED-0603 [mm]
  rect 0.5x1 smd: 1(-0.75,0) 2(0.75,0)
  silkscreen extent -1.12,-0.66 1.75,0.66, body extent -0.82,-0.37 0.83,0.36, height 0.68
"MF51B 103F3435" [mil]
  round 60 hole 35.43: 1(-39.37,0) 2(39.37,0)
  silkscreen extent -80,-40 79,39
NX3215SA-32.768K-STD-MUA-8_ [mm]
  rect 1x1.8 smd: 1(-1.25,0) 2(1.25,0)
  silkscreen extent -0.51,-0.79 0.51,0.79, body extent -1.6,-0.75 1.6,0.75, height 0.8
Res-0201 [mm]
  rect 0.27x0.37 smd mask+0.055: 1(-0.275,0) 2(0.275,0)
  silkscreen extent -0.48,-0.25 0.48,0.25, body extent -0.3,-0.15 0.3,0.15, height 0.29
Res-0402 [mil]
  rect 18x25 smd mask+2.17: 1(-18.5,0) 2(18.5,0)
  silkscreen extent -32,-17 32,16, body extent -23,-11 23,11, height 16
Res-0603 [mil]
  rect 30x35 smd: 1(-30,0) 2(30,0)
  silkscreen extent -48,-21 48,21, body extent -31,-17 31,17, height 18
Res-0805 [mil] "SMD 0805"
  rect 40x50 smd: 1(-40,0) 2(40,0)
  silkscreen extent -64,-29 64,29, body extent -39,-25 39,24, height 24
RVT1E470M0505 [mil]
  rect 90x35.83 smd paste+0 mask+2: 1(-94.48,0) 2(94.48,0)
  silkscreen extent -105,-104 105,104, body extent -112,-104 112,104, height 213
S2B-PH-SM4-TB(LF)(SN) [mm]
  rect 1x3.8 smd paste+0 mask+0.051: 1(-1,2.925) 2(1,2.925)
  rect 1.5x3.4 smd paste+0 mask+0.051: 3(3.35,-2.925) 4(-3.35,-2.925)
  silkscreen extent -3.95,-4.37 3.95,3.22, body extent -3.95,-4.4 3.95,4.2, height 5.5
SK-12D29-G060 [mm]
  round 1.4 hole 0.9: 1(-2,0) 2(0,0) 3(2,0)
  round 2.3 hole 1.2: 4(-4.15,0) 5(4.15,0)
  silkscreen extent -4.25,-5.05 4.25,2.28, body extent -4.3,-5 4.3,2.25, height 3.67
SMA [mm]
  rect 2.5x1.7 smd: 1(-2,0) 2(2,0)
  silkscreen extent -4.45,-1.42 2.06,1.42, body extent -2.6,-1.3 2.6,1.3, height 2.4
SMB_ [mm]
  rect 2.8x2.4 smd: 1(-2.3,0) 2(2.3,0)
  silkscreen extent -2.21,-1.91 4.83,1.91, body extent -2.7,-1.8 2.7,1.8, height 2.3
SMD2520-4P [mm]
  rect 1x0.9 smd: 1(-0.925,-0.775) 2(0.925,-0.775) 3(0.925,0.775) 4(-0.925,0.775)
  silkscreen extent -1.73,-1.09 1.35,1.09, body extent -1.3,-1.05 1.3,1.05, height 0.55
SOT-23 [mm] "TRANS NPN 40V 0.6A SOT23"
  rect 0.82x0.92 smd: 1(-0.95,-1) 2(0.95,-1) 3(0,1)
  silkscreen extent -1.68,-1.3 1.55,0.81, body extent -1.5,-1.25 1.5,1.25, height 1.05
TYPE-C-31-M-17_ [mm]
  rect 0.7x1.6 smd: A5(-0.5,1.99) A9(1.52,1.99) B5(0.5,1.99) B9(-1.52,1.99)
  rect 0.9x1.6 smd: A12(2.75,1.99) B12(-2.75,1.99)
  oval 1x1.7 hole 0.52 slot 1.2 at 90 deg: MH1(4.32,1.81) MH4(-4.32,1.81)
  oval 1x1.75 hole 0.52 slot 1.2 at 90 deg: MH2(4.32,-1.99) MH3(-4.32,-1.99)
  silkscreen extent -4.5,-3.43 4.5,0.75, body extent -4.47,-4.59 4.47,2.21, height 3.21
VG915SNX17-5W2 [mm]
  round 2.5 hole 1.6: 1(0,0)
  silkscreen extent -2.75,-17.6 2.75,-1.43, body extent -2.75,-17.55 2.75,0.45, height 4.85
"Voltlink Target" [mm]
  rect 0.5x1.6 smd: 1(-2.5,-1.262) 2(-1.5,-1.262) 3(-0.5,-1.262) 4(0.5,-1.262) 5(1.5,-1.262) 6(2.5,-1.262)
  rect 1.2x1.8 smd: MP1(-3.8,1.262) MP2(3.8,1.262)
  silkscreen extent -4.06,-1.68 4.06,2.17, body extent -4,-1.49 4,2.11, height 4.25
WSON-6(2x2) [mm]
  rect 0.45x0.3 smd: 1(-0.975,0.65) 2(-0.975,0) 3(-0.975,-0.65) 4(0.975,-0.65) 5(0.975,0) 6(0.975,0.65)
  rect 1x1.6 smd: 7(0,0)
  silkscreen extent -1.5,-1.04 1.04,1.04, body extent -1,-1 1,1, height 0.69
X1321WVS-2x05J-C40D53 [mm]
  rect 0.76x2.4 smd: 1(-2.54,-1.95) 2(-2.54,1.95) 3(-1.27,-1.95) 4(-1.27,1.95) 5(0,-1.95) 6(0,1.95) 7(1.27,-1.95) 8(1.27,1.95) 9(2.54,-1.95) 10(2.54,1.95)
  silkscreen extent -3.43,-2.08 3.23,1.22, body extent -3.17,-2.78 3.18,2.72, height 4.5

## Part data
ANT1: "RF ANT 915MHZ CHIP SOLDER SMD", LCSC Part Number=C17443637, Manufacturer=Johanson, Item Type="RF Antennas", Manufacturer Part Number=0915AT43A0026001E, Pricing="1=0.82, 10=0.585, 25=0.5268, 100=0.4622, 250=0.43144, 500=0.4129 (USD)", RoHS=No, Stock=101852, Supplier=Digikey
ANT2: "1.8 Helical Antenna Vertical 915MHz 50W Antennas ROHS", LCSC Part Number=C718842, Manufacturer=Vollgo, Package=Custom, ComponentLink1Description=LCSC, ComponentLink1URL=https://lcsc.com/product-detail/Antennas_Vollgo-VG915SNX17-5W2_C718842.html, Item Type=Antenna, Manufacturer Part Number=VG915SNX17-5W2
C1 C3 C12: library part GRM21BZ71E106KE15L, "CAP CER 10UF 25V X7R 0805", Case/Package=339Case, LCSC Part Number=C237493, Manufacturer=Murata, Max Operating Temperature=125°C, Min Operating Temperature=-55°C, Tolerance=10%, Voltage Rating=25V, Height=1.45mm, Item Type=Capacitors, Length=2mm, Manufacturer Part Number=GRM21BZ71E106KE15L, Material=4241ConductorMaterial, Pricing="1=0.34, 10=0.142, 50=0.142, 100=0.096, 1000=0.086, 10000=0.058 (USD)", RoHS=Yes, RoHS Compliant=Yes, Stock=43117, Supplier=Mouser, Thickness=1.25mm, Width=1.25mm
C2 C4 C11 C15 C17 C21 C22 C25 C28 C40 C41 C47 C48 C49 C50: library part CC0402KRX7R8BB104, "CAP CER 0.1UF 25V X7R 0402", Capacitance=100nF, Case Code (Imperial)=0402, Case Code (Metric)=1005, Dielectric=X7R, LCSC Part Number=C105883, Manufacturer=Yageo, Max Operating Temperature=125°C, Min Operating Temperature=-55°C, Resistor Type=Ceramic, Supplier Part Number 1=311-2077-1-ND, Tolerance=10%, Voltage Rating=25V, Case/Package=0402, Category="Ceramic Capacitors", ComponentLink1Description=https://datasheet.ciiva.com/11464/upy-gphc-x7r-6-3v-to-50v-8-11464889.pdf?src-supplier=Avnet, ComponentLink1URL=https://datasheet.ciiva.com/11464/upy-gphc-x7r-6-3v-to-50v-8-11464889.pdf?src-supplier=Avnet, ComponentLink2Description=https://datasheet.ciiva.com/13210/upy-gphc-x7r-6-3v-to-50v-8-12304-13210908.pdf?src-supplier=Mouser, ComponentLink2URL=https://datasheet.ciiva.com/13210/upy-gphc-x7r-6-3v-to-50v-8-12304-13210908.pdf?src-supplier=Mouser, ComponentLink3Description=https://datasheet.ciiva.com/17437/upy-gphc-x7r-6-3v-to-50v-8-17437357.pdf?src-supplier=Avnet+Europe, ComponentLink3URL=https://datasheet.ciiva.com/17437/upy-gphc-x7r-6-3v-to-50v-8-17437357.pdf?src-supplier=Avnet+Europe, Depth=0.5mm, Dissipation Factor=3.5%, Halogen Free="Halogen Free", Height=0.5mm, Lead Free="Lead Free", Length=1mm, Manufacturer Part Number=CC0402KRX7R8BB104, Mount="Surface Mount", Packaging="Tape and Reel", Pricing 1="1=0.10000, 10=0.03100, 50=0.01700, 100=0.01390, 500=0.00990, 1000=0.00777, 2500=0.00707, 5000=0.00650 (USD)", Radiation Hardening=No, RoHS=Yes, Stock 1=1841009, Supplier 1=Digi-Key, Termination=SMD/SMT, Thickness=0.022inch, Voltage Rating (DC)=25V, Width=0.02inch
C5 C10: library part CC1206KKX7RCBB472, "CAP CER 4700PF 1KV X7R 1206", Case Code (Imperial)=1206, Case Code (Metric)=3216, Dielectric=X7R, Dielectric Material=Ceramic, LCSC Part Number=C107198, Manufacturer=Yageo, Max Operating Temperature=125°C, Min Operating Temperature=-55°C, Supplier Part Number 1=7130131, Tolerance=10%, Voltage Rating=1kV, Capacitance=4.7nF, Case/Package=1206, Category="Ceramic Capacitors", ComponentLink1Description=https://datasheet.ciiva.com/13208/upy-gp-np0-16v-to-50v-8-13208693.pdf?src-supplier=Mouser, ComponentLink1URL=https://datasheet.ciiva.com/13208/upy-gp-np0-16v-to-50v-8-13208693.pdf?src-supplier=Mouser, ComponentLink2Description=https://datasheet.ciiva.com/11466/hv-11466701.pdf?src-supplier=Avnet, ComponentLink2URL=https://datasheet.ciiva.com/11466/hv-11466701.pdf?src-supplier=Avnet, Depth=1.6mm, Item Type=Capacitor, Lead Free="Lead Free", Length=3.2mm, Manufacturer Part Number=CC1206KKX7RCBB472, Mount="Surface Mount", Number of Pins=2, Packaging="Tape and Reel", Pricing 1="3000=0.02860, 9000=0.02750, 15000=0.02700, 45000=0.02600, 75000=0.02510 (USD)", Radiation Hardening=No, Resistor Type=Ceramic, RoHS=Yes, RoHS Compliant=Yes, Series=CC, Stock 1=180000, Supplier 1="Future Electronics", Termination=SMD/SMT, Thickness=0.057inch, Voltage Rating (DC)=1kV, Weight=0.000571oz, Width=0.063inch
C6 C14: library part GRM21BZ71A226ME15L, "CAP CER 22UF 10V X7R 0805", LCSC Part Number=C907991, Manufacturer=Murata, Max Operating Temperature=125°C, Min Operating Temperature=-55°C, Package=0805, Supplier Part Number=490-GRM21BZ71A226ME15LCT-ND, Tolerance=20%, Voltage Rating=10V, Category="Ceramic Capacitors", ComponentLink1Description=https://datasheet.octopart.com/GRM21BZ71A226ME15L-Murata-datasheet-165579666.pdf?src-supplier=TME, ComponentLink1URL=https://datasheet.octopart.com/GRM21BZ71A226ME15L-Murata-datasheet-165579666.pdf?src-supplier=TME, ComponentLink2Description=LCSC, ComponentLink2URL=https://www.lcsc.com/product-detail/Multilayer-Ceramic-Capacitors-MLCC-SMD-SMT_Murata-Electronics-GRM21BZ71A226ME15L_C907991.html, Height=1.45mm, Item Type=Capacitor, Length=2mm, Manufacturer Part Number=GRM21BZ71A226ME15L, Material=4241ConductorMaterial, Pricing="1=0.39, 10=0.259, 50=0.191, 100=0.1556, 500=0.12282, 1000=0.10372 (USD)", RoHS=Yes, Stock=49126, Supplier=Digi-Key, Thickness=1.25mm, Width=1.25mm
C7 C8 C9: library part GRM188Z71A106KA73D, "CAP CER 10UF 10V X7R 0603", Case/Package=345Case, LCSC Part Number=C2959727, Manufacturer=Murata, Max Operating Temperature=125°C, Min Operating Temperature=-55°C, Tolerance=10%, Voltage Rating=10V, ComponentLink1Description=https://datasheet.octopart.com/GRM188Z71A106KA73D-Murata-datasheet-165579666.pdf?src-supplier=TME, ComponentLink1URL=https://datasheet.octopart.com/GRM188Z71A106KA73D-Murata-datasheet-165579666.pdf?src-supplier=TME, Height=1mm, Item Type=Capacitor, Length=1.6mm, Manufacturer Part Number=GRM188Z71A106KA73D, Material=4241ConductorMaterial, Pricing="1=0.36, 10=0.155, 50=0.155, 100=0.104, 1000=0.094, 10000=0.065 (USD)", RoHS=Yes, RoHS Compliant=Yes, Stock=390983, Supplier=Mouser, Thickness=800um, Width=800um
C13: library part RVT1E470M0505, "47uF 25V 49mA@120Hz ±20% SMD,D5xL5.4mm Aluminum Electrolytic Capacitors - SMD ROHS", LCSC Part Number=C2977553, Manufacturer=ROQANG, Package=SMD,D5xL5.4mm, ComponentLink1Description=LCSC, ComponentLink1URL=https://www.lcsc.com/product-detail/Aluminum-Electrolytic-Capacitors-SMD_ROQANG-RVT1E470M0505_C2977553.html, Item Type=Capacitor, Manufacturer Part Number=RVT1E470M0505
C16 C24 C27: library part CL05A475MO5NUNC, "CAP CER 4.7UF 16V X5R 0402", Case Code (Imperial)=0402, Case Code (Metric)=1005, Manufacturer=Samsung, Max Operating Temperature=85°C, Min Operating Temperature=-55°C, Tolerance=20%, Voltage Rating=16V, Capacitance=4.7uF, Case/Package=0402, Category="Ceramic Capacitors", ComponentLink1Description=http://www.farnell.com/datasheets/2710653.pdf?src-supplier=Farnell, ComponentLink1URL=http://www.farnell.com/datasheets/2710653.pdf?src-supplier=Farnell, ComponentLink2Description=http://www.samsungsem.com/kr/support/product-search/mlcc/CL05A475MO5NUNC.jsp?src-supplier=Digikey, ComponentLink2URL=http://www.samsungsem.com/kr/support/product-search/mlcc/CL05A475MO5NUNC.jsp?src-supplier=Digikey, ComponentLink3Description=http://www.farnell.com/datasheets/2710653.pdf?src-supplier=Element14, ComponentLink3URL=http://www.farnell.com/datasheets/2710653.pdf?src-supplier=Element14, ComponentLink4Description=https://datasheet.octopart.com/CL05A475MO5NUNC-Samsung-Electro-Mechanics-datasheet-123102911.pdf?src-supplier=Future+Electronics, ComponentLink4URL=https://datasheet.octopart.com/CL05A475MO5NUNC-Samsung-Electro-Mechanics-datasheet-123102911.pdf?src-supplier=Future+Electronics, ComponentLink5Description=http://www.farnell.com/datasheets/2710653.pdf?src-supplier=Newark, ComponentLink5URL=http://www.farnell.com/datasheets/2710653.pdf?src-supplier=Newark, Height=550um, Length=0.039inch, Manufacturer Part Number=CL05A475MO5NUNC, Material=4241ConductorMaterial, Mount="Surface Mount", Packaging="Cut Tape", Pricing 1="10000=0.09712 (USD)", RoHS=Yes, RoHS Compliant=Yes, Series=CL, Stock 1=50000, Supplier 1=Avnet, Supplier Part Number 1=CL05A475MO5NUNC, Thickness=0.022inch, Voltage Rating (DC)=16V, Width=0.02inch
C18 C23 C33 C34: library part GJM1555C1H330GB01D, "CAP CER 33PF 50V C0G/NP0 0402", Case/Package=343Case, Dielectric=1510DielectricType, LCSC Part Number=C76905, Manufacturer=Murata, Max Operating Temperature=125°C, Min Operating Temperature=-55°C, Temperature Coefficient=30ppm/°C, Tolerance=2%, Voltage Rating=50V, ComponentLink1Description=https://datasheet.octopart.com/GJM1555C1H330GB01D-Murata-datasheet-12511495.pdf?src-supplier=TME, ComponentLink1URL=https://datasheet.octopart.com/GJM1555C1H330GB01D-Murata-datasheet-12511495.pdf?src-supplier=TME, Height=550um, Item Type=Capacitors, Length=1mm, Manufacturer Part Number=GJM1555C1H330GB01D, Material=4241ConductorMaterial, Pricing="1=0.12, 10=0.069, 50=0.069, 100=0.042, 1000=0.028, 10000=0.018 (USD)", RoHS=Yes, Stock=30599, Supplier=Mouser, Thickness=500um, Voltage Rating (DC)=50V, Width=500um
C19 C20: library part CC0402CRNPO9BN6R8, "CAP CER 6.8PF 50V C0G/NPO 0402", Case Code (Imperial)=0402, Case Code (Metric)=1005, Dielectric=C0G, Insulation Resistance=10GR, LCSC Part Number=C189470, Manufacturer=Yageo, Max Operating Temperature=125°C, Min Operating Temperature=-55°C, Supplier Part Number=3247368, Tolerance=2%, Voltage Rating=50V, Case/Package=0402, Category="Ceramic Capacitors", ComponentLink1Description=https://datasheet.ciiva.com/11587/upy-gp-np0-16v-to-50v-8-11587182.pdf?src-supplier=Avnet, ComponentLink1URL=https://datasheet.ciiva.com/11587/upy-gp-np0-16v-to-50v-8-11587182.pdf?src-supplier=Avnet, Construction=Flat, Depth=0.5mm, Height=0.5mm, Item Type=Capacitor, Length=1mm, Manufacturer Part Number=CC0402CRNPO9BN6R8, Mounting Technology="Surface Mount", Packaging="Tape and Reel", Pricing="10000=0.0024, 40000=0.0022, 150000=0.0021, 400000=0.002, 1000000=0.0019 (USD)", Radiation Hardening=No, RoHS=Yes, RoHS Compliant=Yes, Series=CC, Stock=200000, Supplier="Future Electronics", Termination=SMD/SMT, Voltage Rating (DC)=50V, Weight=2.3E-05oz, Width=0.5mm
C26: library part GRM155R70J105KA12J, "CAP CER 1UF 6.3V X7R 0402", Case Code (Imperial)=0402, Case Code (Metric)=1005, Dielectric=X7R, LCSC Part Number=C2167130, Manufacturer=Murata, Max Operating Temperature=125°C, Min Operating Temperature=-55°C, Package Quantity=50000, Tolerance=10%, Voltage Rating=6.3V, Case/Package=0402, ComponentLink1Description=http://www.mouser.com/ds/2/281/c02e-2905.pdf?src-supplier=Mouser, ComponentLink1URL=http://www.mouser.com/ds/2/281/c02e-2905.pdf?src-supplier=Mouser, ComponentLink2Description=https://datasheet.octopart.com/GRM155R70J105KA12J-Murata-datasheet-32479577.pdf?src-supplier=Future+Electronics, ComponentLink2URL=https://datasheet.octopart.com/GRM155R70J105KA12J-Murata-datasheet-32479577.pdf?src-supplier=Future+Electronics, ComponentLink3Description=https://datasheet.octopart.com/GRM155R70J105KA12J-Murata-datasheet-155345054.pdf?src-supplier=Element14, ComponentLink3URL=https://datasheet.octopart.com/GRM155R70J105KA12J-Murata-datasheet-155345054.pdf?src-supplier=Element14, ComponentLink4Description=http://search.murata.co.jp/Ceramy/image/img/A01X/G101/ENG/GRM155R70J105KA12-01.pdf?src-supplier=Digikey, ComponentLink4URL=http://search.murata.co.jp/Ceramy/image/img/A01X/G101/ENG/GRM155R70J105KA12-01.pdf?src-supplier=Digikey, ComponentLink5Description=https://datasheet.octopart.com/GRM155R70J105KA12J-Murata-datasheet-165579666.pdf?src-supplier=TME, ComponentLink5URL=https://datasheet.octopart.com/GRM155R70J105KA12J-Murata-datasheet-165579666.pdf?src-supplier=TME, Height=550um, Item Type=Capacitors, Length=0.039inch, Manufacturer Part Number=GRM155R70J105KA12J, Material=4241ConductorMaterial, Mounting Technology="Surface Mount", Packaging="Tape and Reel", Pins=2NUMBER, Pricing="1=0.1, 10=0.01, 50=0.01, 100=0.008, 1000=0.008, 10000=0.007 (USD)", RoHS=Yes, RoHS Compliant=Yes, Series=GRM, Stock=273640, Supplier=Mouser, Termination=SMD/SMT, Thickness=0.022inch, Voltage Rating (DC)=6.3V, Weight=0.000212oz, Width=0.02inch
C29: library part GRM155R61H474KE11D, "CAP CER 0.47UF 50V X5R 0402", Case Code (Imperial)=0402, Case Code (Metric)=1005, Dielectric=X5R, LCSC Part Number=C437527, Manufacturer=Murata, Max Operating Temperature=85°C, Min Operating Temperature=-55°C, Tolerance=10%, Voltage Rating=50V, Case/Package=0402, ComponentLink1Description=https://datasheet.octopart.com/GRM155R61H474KE11D-Murata-datasheet-149523035.pdf?src-supplier=Newark, ComponentLink1URL=https://datasheet.octopart.com/GRM155R61H474KE11D-Murata-datasheet-149523035.pdf?src-supplier=Newark, ComponentLink2Description=https://datasheet.octopart.com/GRM155R61H474KE11D-Murata-datasheet-99353828.pdf?src-supplier=Future+Electronics, ComponentLink2URL=https://datasheet.octopart.com/GRM155R61H474KE11D-Murata-datasheet-99353828.pdf?src-supplier=Future+Electronics, ComponentLink3Description=http://search.murata.co.jp/Ceramy/image/img/A01X/G101/ENG/GRM155R61H474KE11-01.pdf?src-supplier=Digikey, ComponentLink3URL=http://search.murata.co.jp/Ceramy/image/img/A01X/G101/ENG/GRM155R61H474KE11-01.pdf?src-supplier=Digikey, ComponentLink4Description=https://search.murata.co.jp/Ceramy/image/img/A01X/G101/ENG/GRM155R61H474KE11-01.pdf?src-supplier=Digikey, ComponentLink4URL=https://search.murata.co.jp/Ceramy/image/img/A01X/G101/ENG/GRM155R61H474KE11-01.pdf?src-supplier=Digikey, ComponentLink5Description=https://datasheet.octopart.com/GRM155R61H474KE11D-Murata-datasheet-118179445.pdf?src-supplier=LCSC, ComponentLink5URL=https://datasheet.octopart.com/GRM155R61H474KE11D-Murata-datasheet-118179445.pdf?src-supplier=LCSC, ComponentLink6Description=https://datasheet.octopart.com/GRM155R61H474KE11D-Murata-datasheet-165579666.pdf?src-supplier=TME, ComponentLink6URL=https://datasheet.octopart.com/GRM155R61H474KE11D-Murata-datasheet-165579666.pdf?src-supplier=TME, Height=600um, Item Type=Capacitors, Length=1mm, Manufacturer Part Number=GRM155R61H474KE11D, Material=4241ConductorMaterial, Mounting Technology="Surface Mount", Packaging="Cut Tape", Pricing="7407=0.0141, 15000=0.01 (USD)", RoHS=Yes, RoHS Compliant=Yes, Series=GRM, Stock=22879, Supplier="Arrow Electronics", Thickness=500um, Voltage Rating (DC)=50V, Width=500um
C30: library part CC0402KRX7R9BB473, "CAP CER 0.047UF 50V X7R 0402", Case Code (Imperial)=0402, Case Code (Metric)=1005, Dielectric=1511DielectricType, LCSC Part Number=C272875, Manufacturer=Yageo, Max Operating Temperature=125°C, Min Operating Temperature=-55°C, Supplier Part Number=2095687, Temperature Coefficient=30ppm/°C, Tolerance=10%, Voltage Rating=50V, Case/Package=0402, Category="Ceramic Capacitors", ComponentLink1Description=https://datasheet.octopart.com/CC0402KRX7R9BB473-Yageo-datasheet-166511530.pdf?src-supplier=Future+Electronics, ComponentLink1URL=https://datasheet.octopart.com/CC0402KRX7R9BB473-Yageo-datasheet-166511530.pdf?src-supplier=Future+Electronics, ComponentLink2Description=http://www.yageo.com/documents/recent/UPY-GPHC_X7R_6.3V-to-50V_18.pdf?src-supplier=Digikey, ComponentLink2URL=http://www.yageo.com/documents/recent/UPY-GPHC_X7R_6.3V-to-50V_18.pdf?src-supplier=Digikey, ComponentLink3Description=https://datasheet.octopart.com/CC0402KRX7R9BB473-Yageo-datasheet-140260305.pdf?src-supplier=Newark, ComponentLink3URL=https://datasheet.octopart.com/CC0402KRX7R9BB473-Yageo-datasheet-140260305.pdf?src-supplier=Newark, Halogen Free=5694HalogenFree, Height=550um, Item Type=Capacitor, Lead Free=5697LeadFree, Length=0.039inch, Manufacturer Part Number=CC0402KRX7R9BB473, Material=4241ConductorMaterial, Mounting Technology="Surface Mount", Packaging="Tape and Reel", Pricing="10000=0.0044, 40000=0.0042, 100000=0.004, 150000=0.0041, 250000=0.0039, 400000=0.0037, 500000=0.0038 (USD)", RoHS=Yes, RoHS Compliant=Yes, Series=CC, Stock=1130000, Supplier="Future Electronics", Thickness=0.022inch, Voltage Rating (DC)=50V, Width=0.02inch
C31: library part CC0402FRNPO9BN680, "CAP CER 68PF 50V C0G/NPO 0402", LCSC Part Number=C389103, Manufacturer=Yageo, ComponentLink1Description=https://datasheet.ciiva.com/15189/getdatasheetpartid-646623-15189115.pdf?src-supplier=Verical, ComponentLink1URL=https://datasheet.ciiva.com/15189/getdatasheetpartid-646623-15189115.pdf?src-supplier=Verical, ComponentLink2Description=https://datasheet.ciiva.com/11587/upy-gp-np0-16v-to-50v-8-11587064.pdf?src-supplier=Avnet, ComponentLink2URL=https://datasheet.ciiva.com/11587/upy-gp-np0-16v-to-50v-8-11587064.pdf?src-supplier=Avnet, ComponentLink3Description=https://datasheet.ciiva.com/13210/upy-gp-np0-16v-to-50v-8-13210234.pdf?src-supplier=Mouser, ComponentLink3URL=https://datasheet.ciiva.com/13210/upy-gp-np0-16v-to-50v-8-13210234.pdf?src-supplier=Mouser, Halogen Free=5694HalogenFree, Item Type=Capacitors, Lead Free=5697LeadFree, Manufacturer Part Number=CC0402FRNPO9BN680, Pricing="1=0.1, 10=0.049, 100=0.0288, 1000=0.01861, 2500=0.01608, 5000=0.01457 (USD)", RoHS=Yes, Stock=155, Supplier=Digikey
C32 C38: library part GRM1555C1H2R2BA01D, "CAP CER 2.2PF 50V C0G/NP0 0402", Case Code (Imperial)=0402, Case Code (Metric)=1005, Dielectric=C0G, LCSC Part Number=C88927, Manufacturer=Murata, Max Operating Temperature=125°C, Min Operating Temperature=-55°C, Package Quantity=1, Temperature Coefficient=30ppm/°C, Voltage=50V, Case/Package=0402, Category="Ceramic Capacitors", ComponentLink1Description=https://datasheet.ciiva.com/6270/grm1555c1h2r1wa01-01-6270869.pdf?src-supplier=Digi-Key, ComponentLink1URL=https://datasheet.ciiva.com/6270/grm1555c1h2r1wa01-01-6270869.pdf?src-supplier=Digi-Key, ComponentLink2Description=https://datasheet.ciiva.com/18184/getdatasheetpartid-316203-18184296.pdf?src-supplier=Verical, ComponentLink2URL=https://datasheet.ciiva.com/18184/getdatasheetpartid-316203-18184296.pdf?src-supplier=Verical, ComponentLink3Description=https://datasheet.ciiva.com/16440/c02e-16440539.pdf?src-supplier=Future+Electronics, ComponentLink3URL=https://datasheet.ciiva.com/16440/c02e-16440539.pdf?src-supplier=Future+Electronics, ComponentLink4Description=https://datasheet.ciiva.com/6270/partnumbering-e-01-6270873.pdf?src-supplier=Digi-Key, ComponentLink4URL=https://datasheet.ciiva.com/6270/partnumbering-e-01-6270873.pdf?src-supplier=Digi-Key, ComponentLink5Description=https://datasheet.ciiva.com/6270/partnumbering-e-01-6270877.pdf?src-supplier=Digi-Key, ComponentLink5URL=https://datasheet.ciiva.com/6270/partnumbering-e-01-6270877.pdf?src-supplier=Digi-Key, ComponentLink6Description=https://datasheet.ciiva.com/11615/product-11615030.pdf?src-supplier=Avnet, ComponentLink6URL=https://datasheet.ciiva.com/11615/product-11615030.pdf?src-supplier=Avnet, Construction=Flat, Depth=0.5mm, Height=0.5mm, Item Type=Capacitor, Lead Free="Lead Free", Length=1mm, Manufacturer Part Number=GRM1555C1H2R2BA01D, Material=Ceramic, Mounting Technology="Surface Mount", Packaging="Tape and Reel", Pricing="10000=0.00887, 20000=0.00867, 40000=0.00847 (USD)", Radiation Hardening=No, Reach SVHC Compliant=No, RoHS=Yes, RoHS Compliant=Yes, Series=GRM, Stock=110000, Supplier=Avnet, Supplier Part Number=GRM1555C1H2R2BA01D, Termination=SMD/SMT, Thickness=0.022inch, Voltage Rating=50V, Voltage Rating (DC)=50V, Width=0.5mm
C35: library part GRM155R71H103KA88D, "CAP CER 10000PF 50V X7R 0402", Case Code (Imperial)=0402, Case Code (Metric)=1005, Dielectric=X7R, LCSC Part Number=C77019, Manufacturer=Murata, Max Operating Temperature=125°C, Min Operating Temperature=-55°C, Package Quantity=1, Tolerance=10%, Voltage=25V, Voltage Rating=50V, Case/Package=0402, ComponentLink1Description=https://datasheet.ciiva.com/22698/1747449-22698420.pdf?src-supplier=Element14, ComponentLink1URL=https://datasheet.ciiva.com/22698/1747449-22698420.pdf?src-supplier=Element14, ComponentLink2Description=https://datasheet.ciiva.com/19476/1856433-19476546.pdf?src-supplier=Jameco, ComponentLink2URL=https://datasheet.ciiva.com/19476/1856433-19476546.pdf?src-supplier=Jameco, ComponentLink3Description=https://datasheet.ciiva.com/129/product-129810.pdf?src-supplier=Digikey, ComponentLink3URL=https://datasheet.ciiva.com/129/product-129810.pdf?src-supplier=Digikey, ComponentLink4Description=https://datasheet.ciiva.com/11786/0900766b80ef921d-11786340.pdf?src-supplier=Rs, ComponentLink4URL=https://datasheet.ciiva.com/11786/0900766b80ef921d-11786340.pdf?src-supplier=Rs, ComponentLink5Description=https://datasheet.ciiva.com/18100/getdatasheetpartid-27434-18100660.pdf?src-supplier=Verical, ComponentLink5URL=https://datasheet.ciiva.com/18100/getdatasheetpartid-27434-18100660.pdf?src-supplier=Verical, ComponentLink6Description=https://datasheet.ciiva.com/29199/454225-da-01-en-vs-kondensator-0402-29199740.pdf?src-supplier=Conrad, ComponentLink6URL=https://datasheet.ciiva.com/29199/454225-da-01-en-vs-kondensator-0402-29199740.pdf?src-supplier=Conrad, ComponentLink7Description=https://datasheet.ciiva.com/129/grm155r71h103ka88-01-129811.pdf?src-supplier=Digikey, ComponentLink7URL=https://datasheet.ciiva.com/129/grm155r71h103ka88-01-129811.pdf?src-supplier=Digikey, ComponentLink8Description=https://datasheet.ciiva.com/129/grm155r71h103ka88-01-129812.pdf?src-supplier=Digikey, ComponentLink8URL=https://datasheet.ciiva.com/129/grm155r71h103ka88-01-129812.pdf?src-supplier=Digikey, ComponentLink9Description=https://datasheet.ciiva.com/5410/product-5410990.pdf?src-supplier=Mouser, ComponentLink9URL=https://datasheet.ciiva.com/5410/product-5410990.pdf?src-supplier=Mouser, ComponentLink10Description=https://datasheet.ciiva.com/16495/product-16495290.pdf?src-supplier=Future+Electronics, ComponentLink10URL=https://datasheet.ciiva.com/16495/product-16495290.pdf?src-supplier=Future+Electronics, Construction=Flat, Depth=0.5mm, Height=0.5mm, Item Type=Capacitors, Lead Free=5697LeadFree, Length=1mm, Manufacturer Part Number=GRM155R71H103KA88D, Material=Ceramic, Mounting Technology="Surface Mount", Packaging="Tape and Reel", Pins=2, Pricing="30000=0.0032, 50000=0.003, 70000=0.0029, 100000=0.0028, 250000=0.0025, 500000=0.0023 (USD)", Radiation Hardening=No, Reach SVHC Compliant=No, RoHS=Yes, RoHS Compliant=Yes, Series=GRM, Stock=7440000, Supplier="Arrow Electronics", Termination=SMD/SMT, Thickness=0.022inch, Voltage Rating (DC)=50V, Width=0.02inch
C36: library part GJM1555C1HR70BB01D, "CAP CER 0.7PF 50V C0G/NP0 0402", LCSC Part Number=C161349, Manufacturer=Murata, Temperature Coefficient=30ppm/°C, ComponentLink1Description=https://datasheet.ciiva.com/6270/product-6270549.pdf?src-supplier=Digikey, ComponentLink1URL=https://datasheet.ciiva.com/6270/product-6270549.pdf?src-supplier=Digikey, ComponentLink2Description=https://datasheet.ciiva.com/6270/partnumbering-e-01-6270550.pdf?src-supplier=Digikey, ComponentLink2URL=https://datasheet.ciiva.com/6270/partnumbering-e-01-6270550.pdf?src-supplier=Digikey, ComponentLink3Description=https://datasheet.ciiva.com/6270/partnumbering-e-01-6270551.pdf?src-supplier=Digikey, ComponentLink3URL=https://datasheet.ciiva.com/6270/partnumbering-e-01-6270551.pdf?src-supplier=Digikey, ComponentLink4Description=https://datasheet.ciiva.com/11616/product-11616965.pdf?src-supplier=Avnet, ComponentLink4URL=https://datasheet.ciiva.com/11616/product-11616965.pdf?src-supplier=Avnet, Item Type=Capacitors, Lead Free=5697LeadFree, Manufacturer Part Number=GJM1555C1HR70BB01D, Material=4241ConductorMaterial, Pricing="979=0.0104 (USD)", RoHS=Yes, Stock=979, Supplier="Arrow Electronics"
C37: library part GJM1555C1H7R5BB01D, "CAP CER 7.5PF 50V C0G/NP0 0402", LCSC Part Number=C497526, Manufacturer=Murata, Temperature Coefficient=30ppm/°C, ComponentLink1Description=https://datasheet.ciiva.com/11610/product-11610696.pdf?src-supplier=Avnet, ComponentLink1URL=https://datasheet.ciiva.com/11610/product-11610696.pdf?src-supplier=Avnet, Item Type=Capacitors, Manufacturer Part Number=GJM1555C1H7R5BB01D, Material=4241ConductorMaterial, Pricing="9925=0.0103 (USD)", RoHS=Yes, Stock=9925, Supplier="Arrow Electronics"
C39: library part GJM1555C1H4R0BB01D, "CAP CER 4PF 50V C0G/NP0 0402", Case Code (Imperial)=0402, Case Code (Metric)=1005, Dielectric=C0G, LCSC Part Number=C161323, Manufacturer=Murata, Max Operating Temperature=125°C, Min Operating Temperature=-55°C, Package Quantity=1, Temperature Coefficient=30ppm/°C, Voltage Rating=50V, Case/Package=0402, ComponentLink1Description=https://datasheet.ciiva.com/11613/product-11613609.pdf?src-supplier=Avnet, ComponentLink1URL=https://datasheet.ciiva.com/11613/product-11613609.pdf?src-supplier=Avnet, ComponentLink2Description=https://datasheet.ciiva.com/26947/getdatasheetpartid-725490-26947669.pdf?src-supplier=Verical, ComponentLink2URL=https://datasheet.ciiva.com/26947/getdatasheetpartid-725490-26947669.pdf?src-supplier=Verical, ComponentLink3Description=https://datasheet.ciiva.com/29542/partnumbering-e-01-29542697.pdf?src-supplier=Digikey, ComponentLink3URL=https://datasheet.ciiva.com/29542/partnumbering-e-01-29542697.pdf?src-supplier=Digikey, ComponentLink4Description=https://datasheet.ciiva.com/29542/partnumbering-e-01-29542696.pdf?src-supplier=Digikey, ComponentLink4URL=https://datasheet.ciiva.com/29542/partnumbering-e-01-29542696.pdf?src-supplier=Digikey, ComponentLink5Description=https://datasheet.ciiva.com/29542/partnumbering-e-01-29542698.pdf?src-supplier=Digikey, ComponentLink5URL=https://datasheet.ciiva.com/29542/partnumbering-e-01-29542698.pdf?src-supplier=Digikey, Construction=Flat, Depth=0.5mm, Height=0.5mm, Item Type=Capacitors, Lead Free="Lead Free", Length=1mm, Manufacturer Part Number=GJM1555C1H4R0BB01D, Material=4241ConductorMaterial, Mounting Technology="Surface Mount", Packaging="Tape and Reel", Pricing="10000=0.0105 (USD)", Radiation Hardening=No, RoHS=Yes, RoHS Compliant=Yes, Series=GJM, Stock=40000, Supplier="Arrow Electronics", Termination=SMD/SMT, Thickness=0.022inch, Voltage Rating (DC)=50V, Width=0.02inch
C42: library part GCM1555C1H470FA16D, "CAP CER 47PF 50V C0G/NP0 0402", Case Code (Imperial)=0402, Case Code (Metric)=1005, LCSC Part Number=C393684, Manufacturer=Murata, Max Operating Temperature=125°C, Min Operating Temperature=-55°C, Ratings=AEC-Q200, Supplier Part Number 1=490-16445-1-ND, Tolerance=1%, Voltage Rating=50V, Capacitance=47pF, Case/Package=0402, Category="Ceramic Capacitors", ComponentLink1Description=http://search.murata.co.jp/Ceramy/image/img/A01X/G101/ENG/GCM1555C1H470FA16-01.pdf?src-supplier=Digi-Key, ComponentLink1URL=http://search.murata.co.jp/Ceramy/image/img/A01X/G101/ENG/GCM1555C1H470FA16-01.pdf?src-supplier=Digi-Key, Manufacturer Part Number=GCM1555C1H470FA16D, Mount="Surface Mount", Packaging="Tape and Reel", Pricing 1="1=0.11000, 10=0.07900, 50=0.04500, 100=0.03730, 500=0.02618, 1000=0.02168, 2500=0.02018, 5000=0.01846 (USD)", RoHS=No, Stock 1=27098, Supplier 1=Digi-Key